# Altium PCB Pod_Islands_Panel.PcbDoc (part 1 of 10)
Units mm, origin at the board's own origin, x right, y up, seen from the top; angles counter-clockwise.
Board outline 95.7 x 83.7 mm, 6 copper layers (Top Layer, Inner1, Inner2, Inner3, Inner4, Bottom Layer), stack 0.82 mm thick; 1100 components, 940 nets, 4944 pads, 3680 vias.
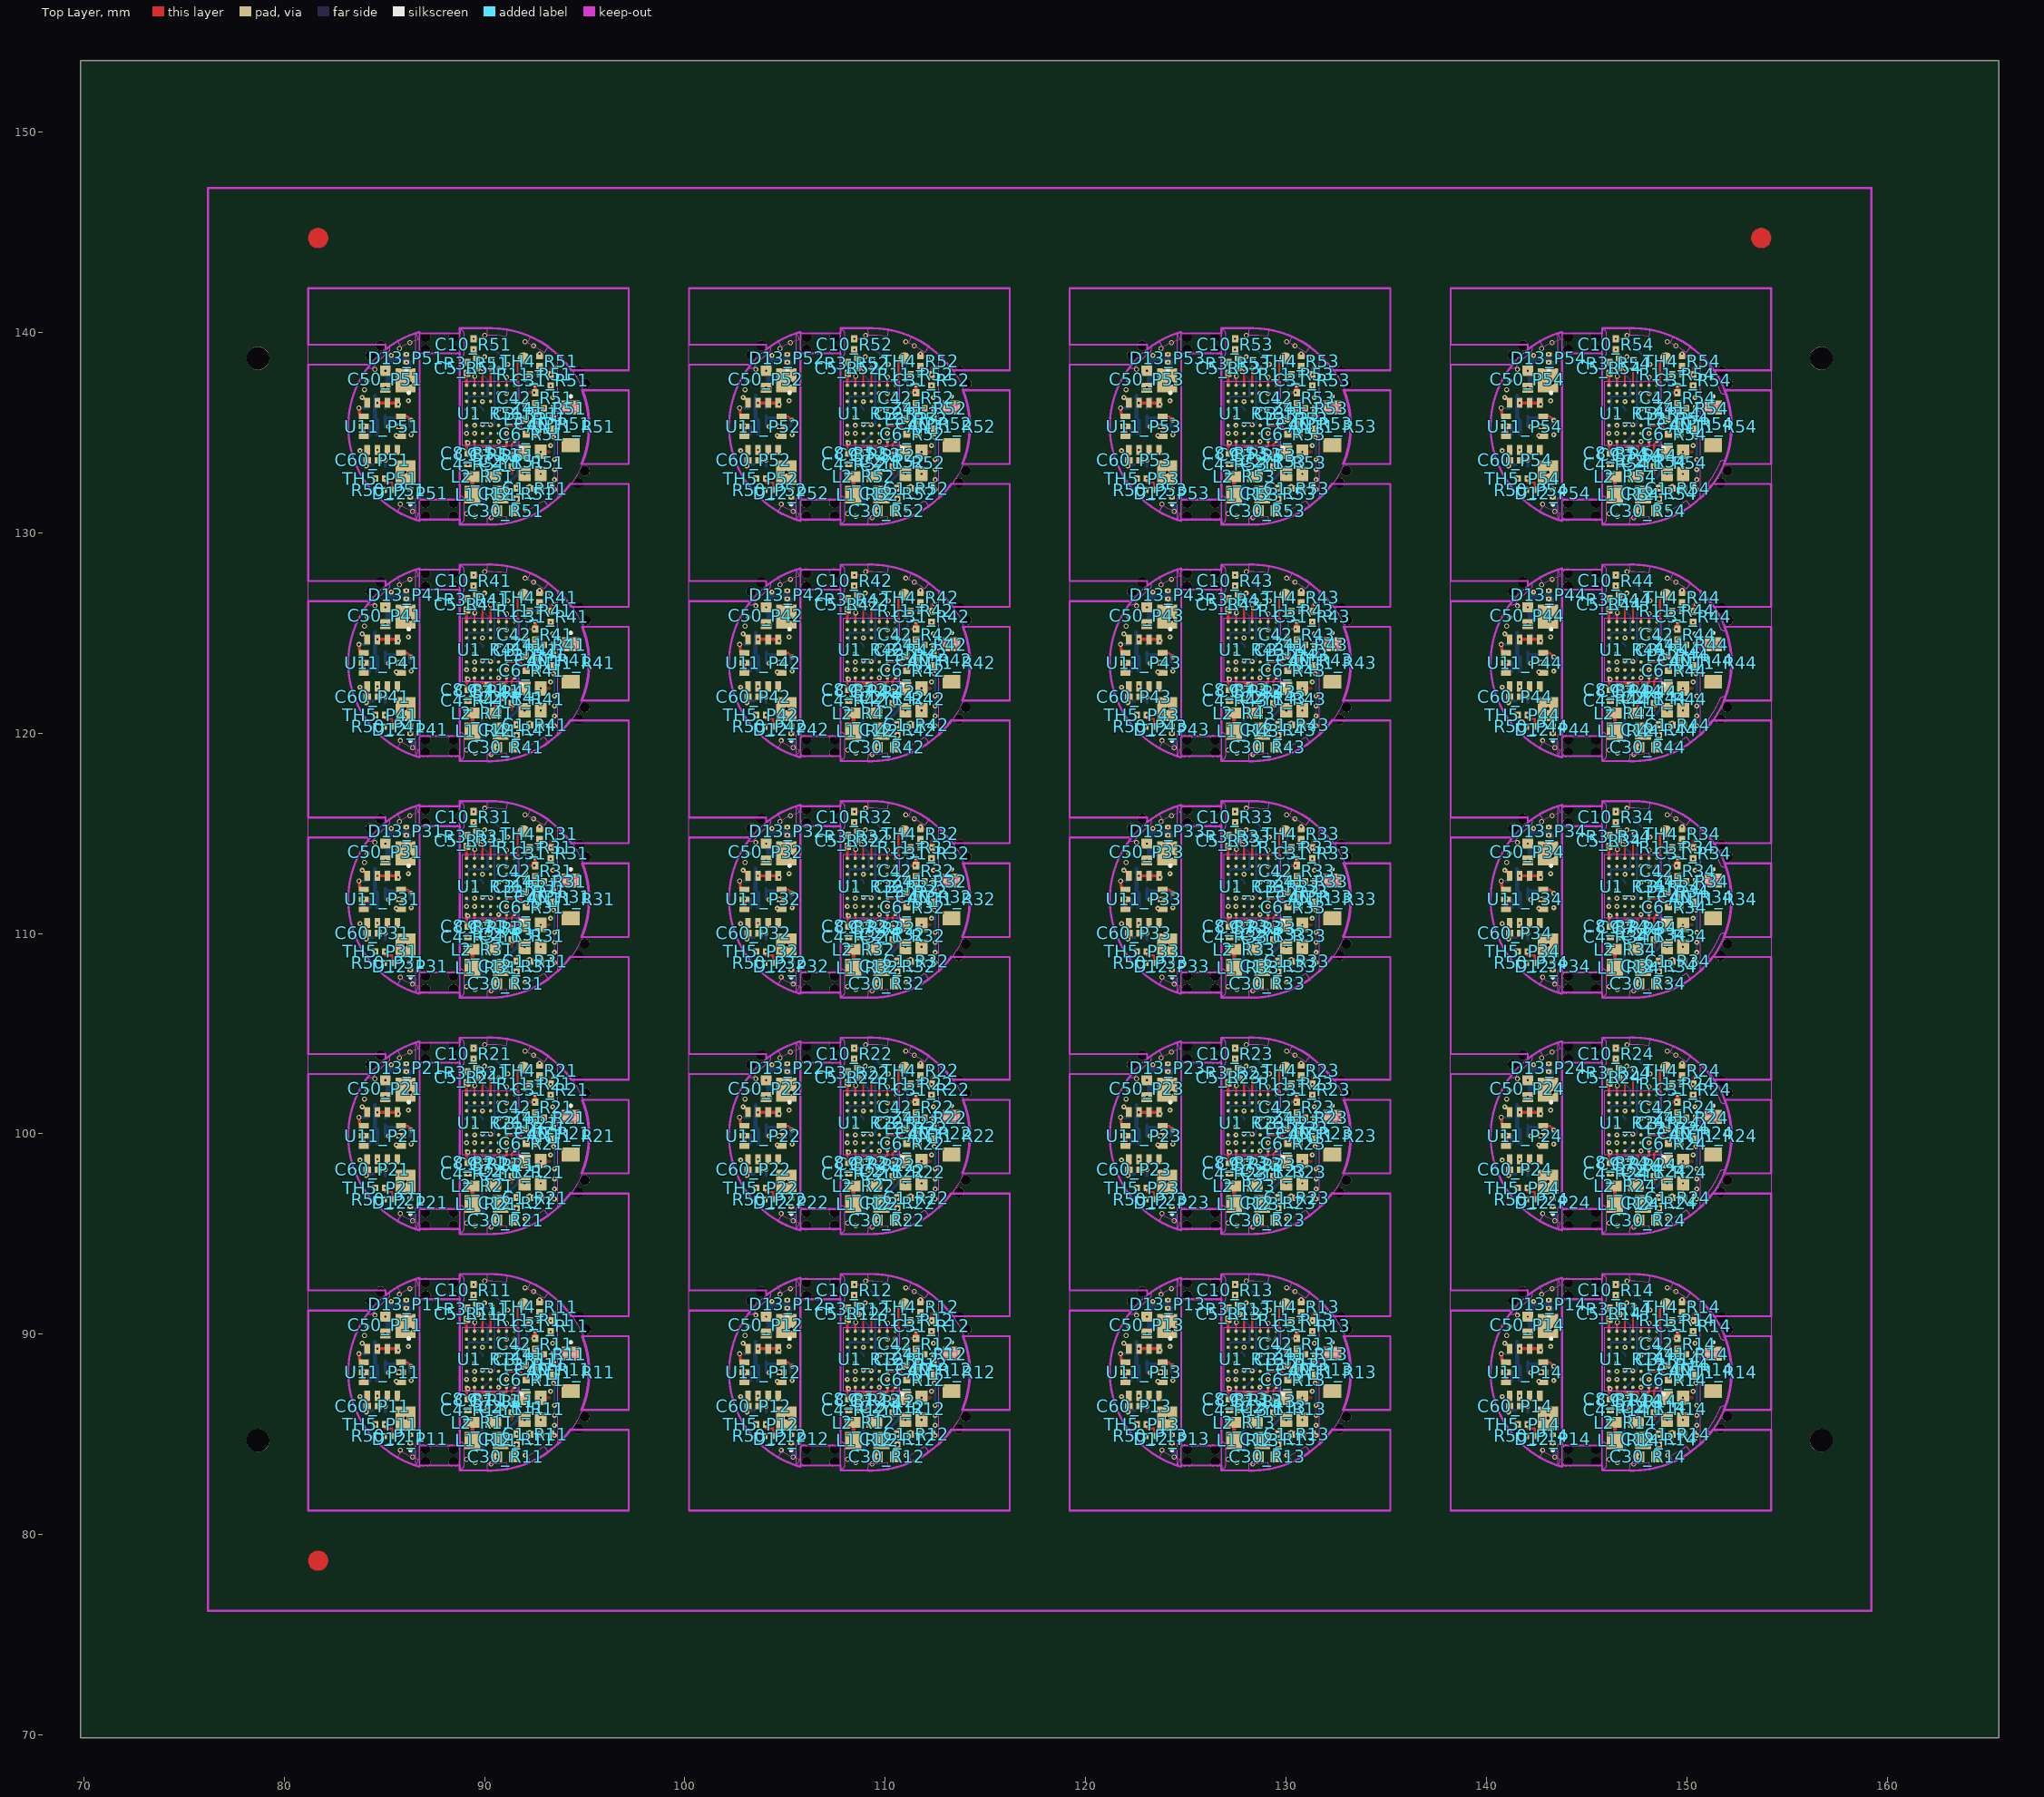
[diagram p0: Top Layer view]
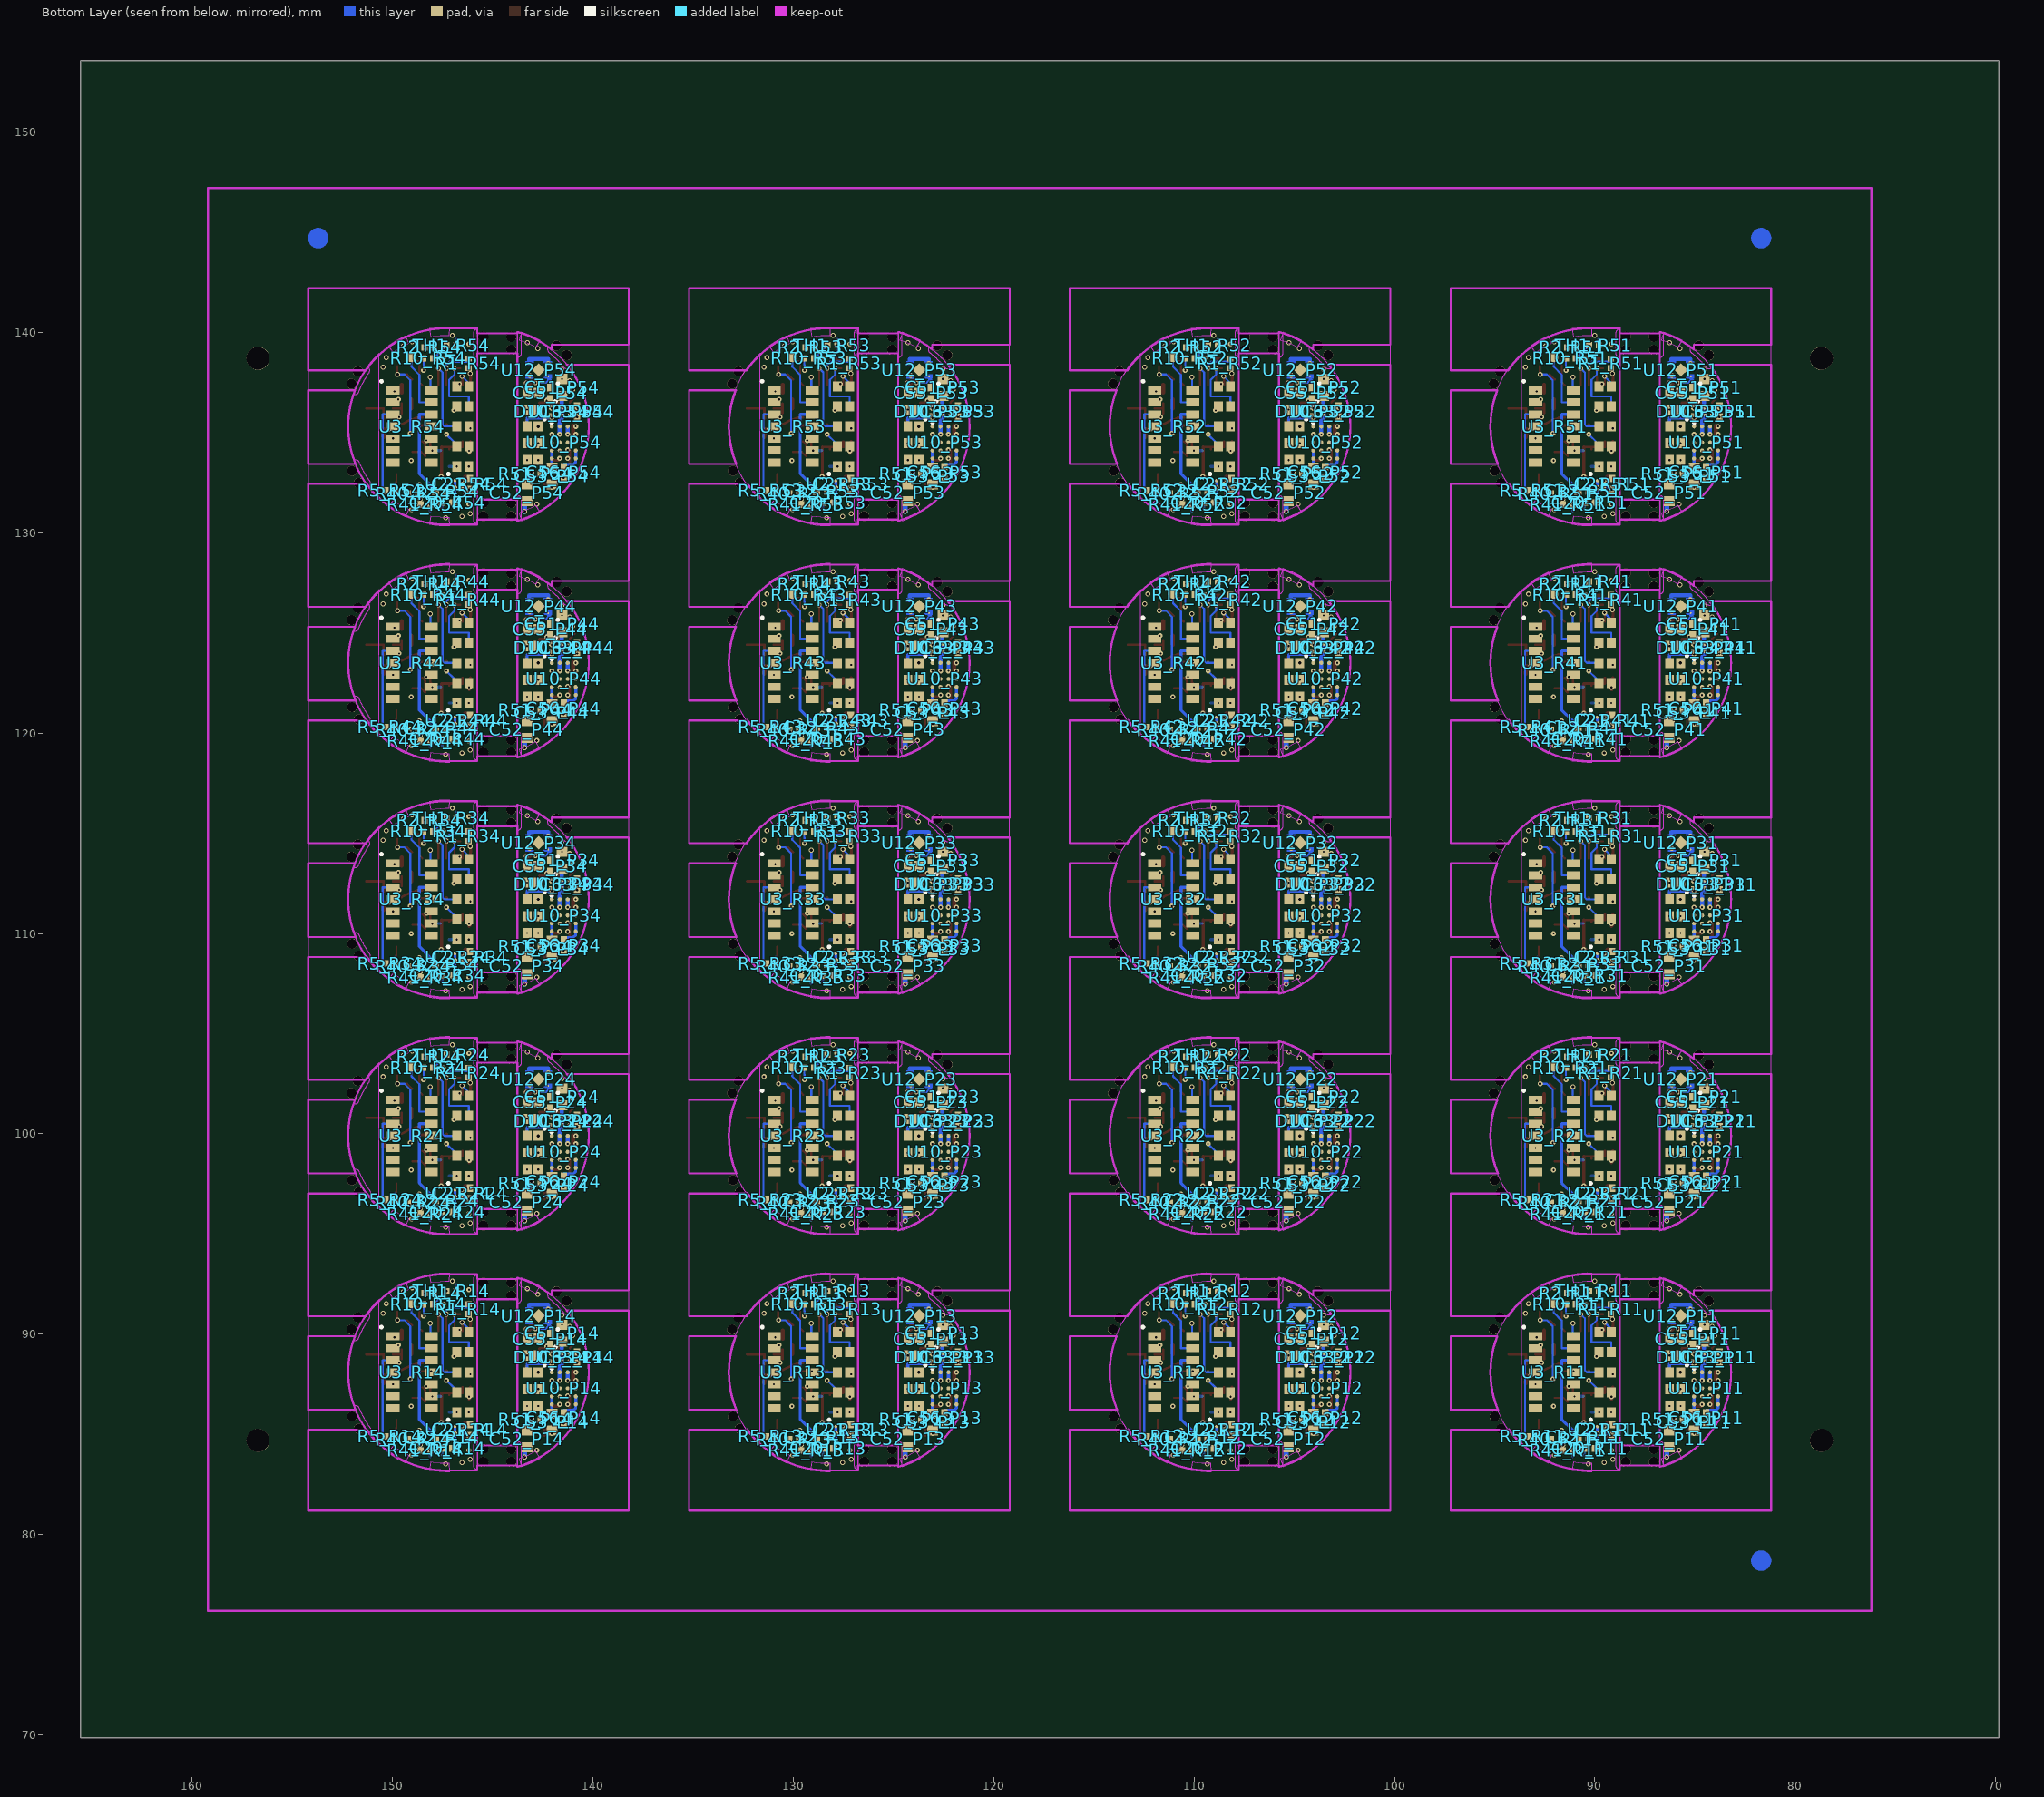
[diagram p1: Bottom Layer view, seen from below]
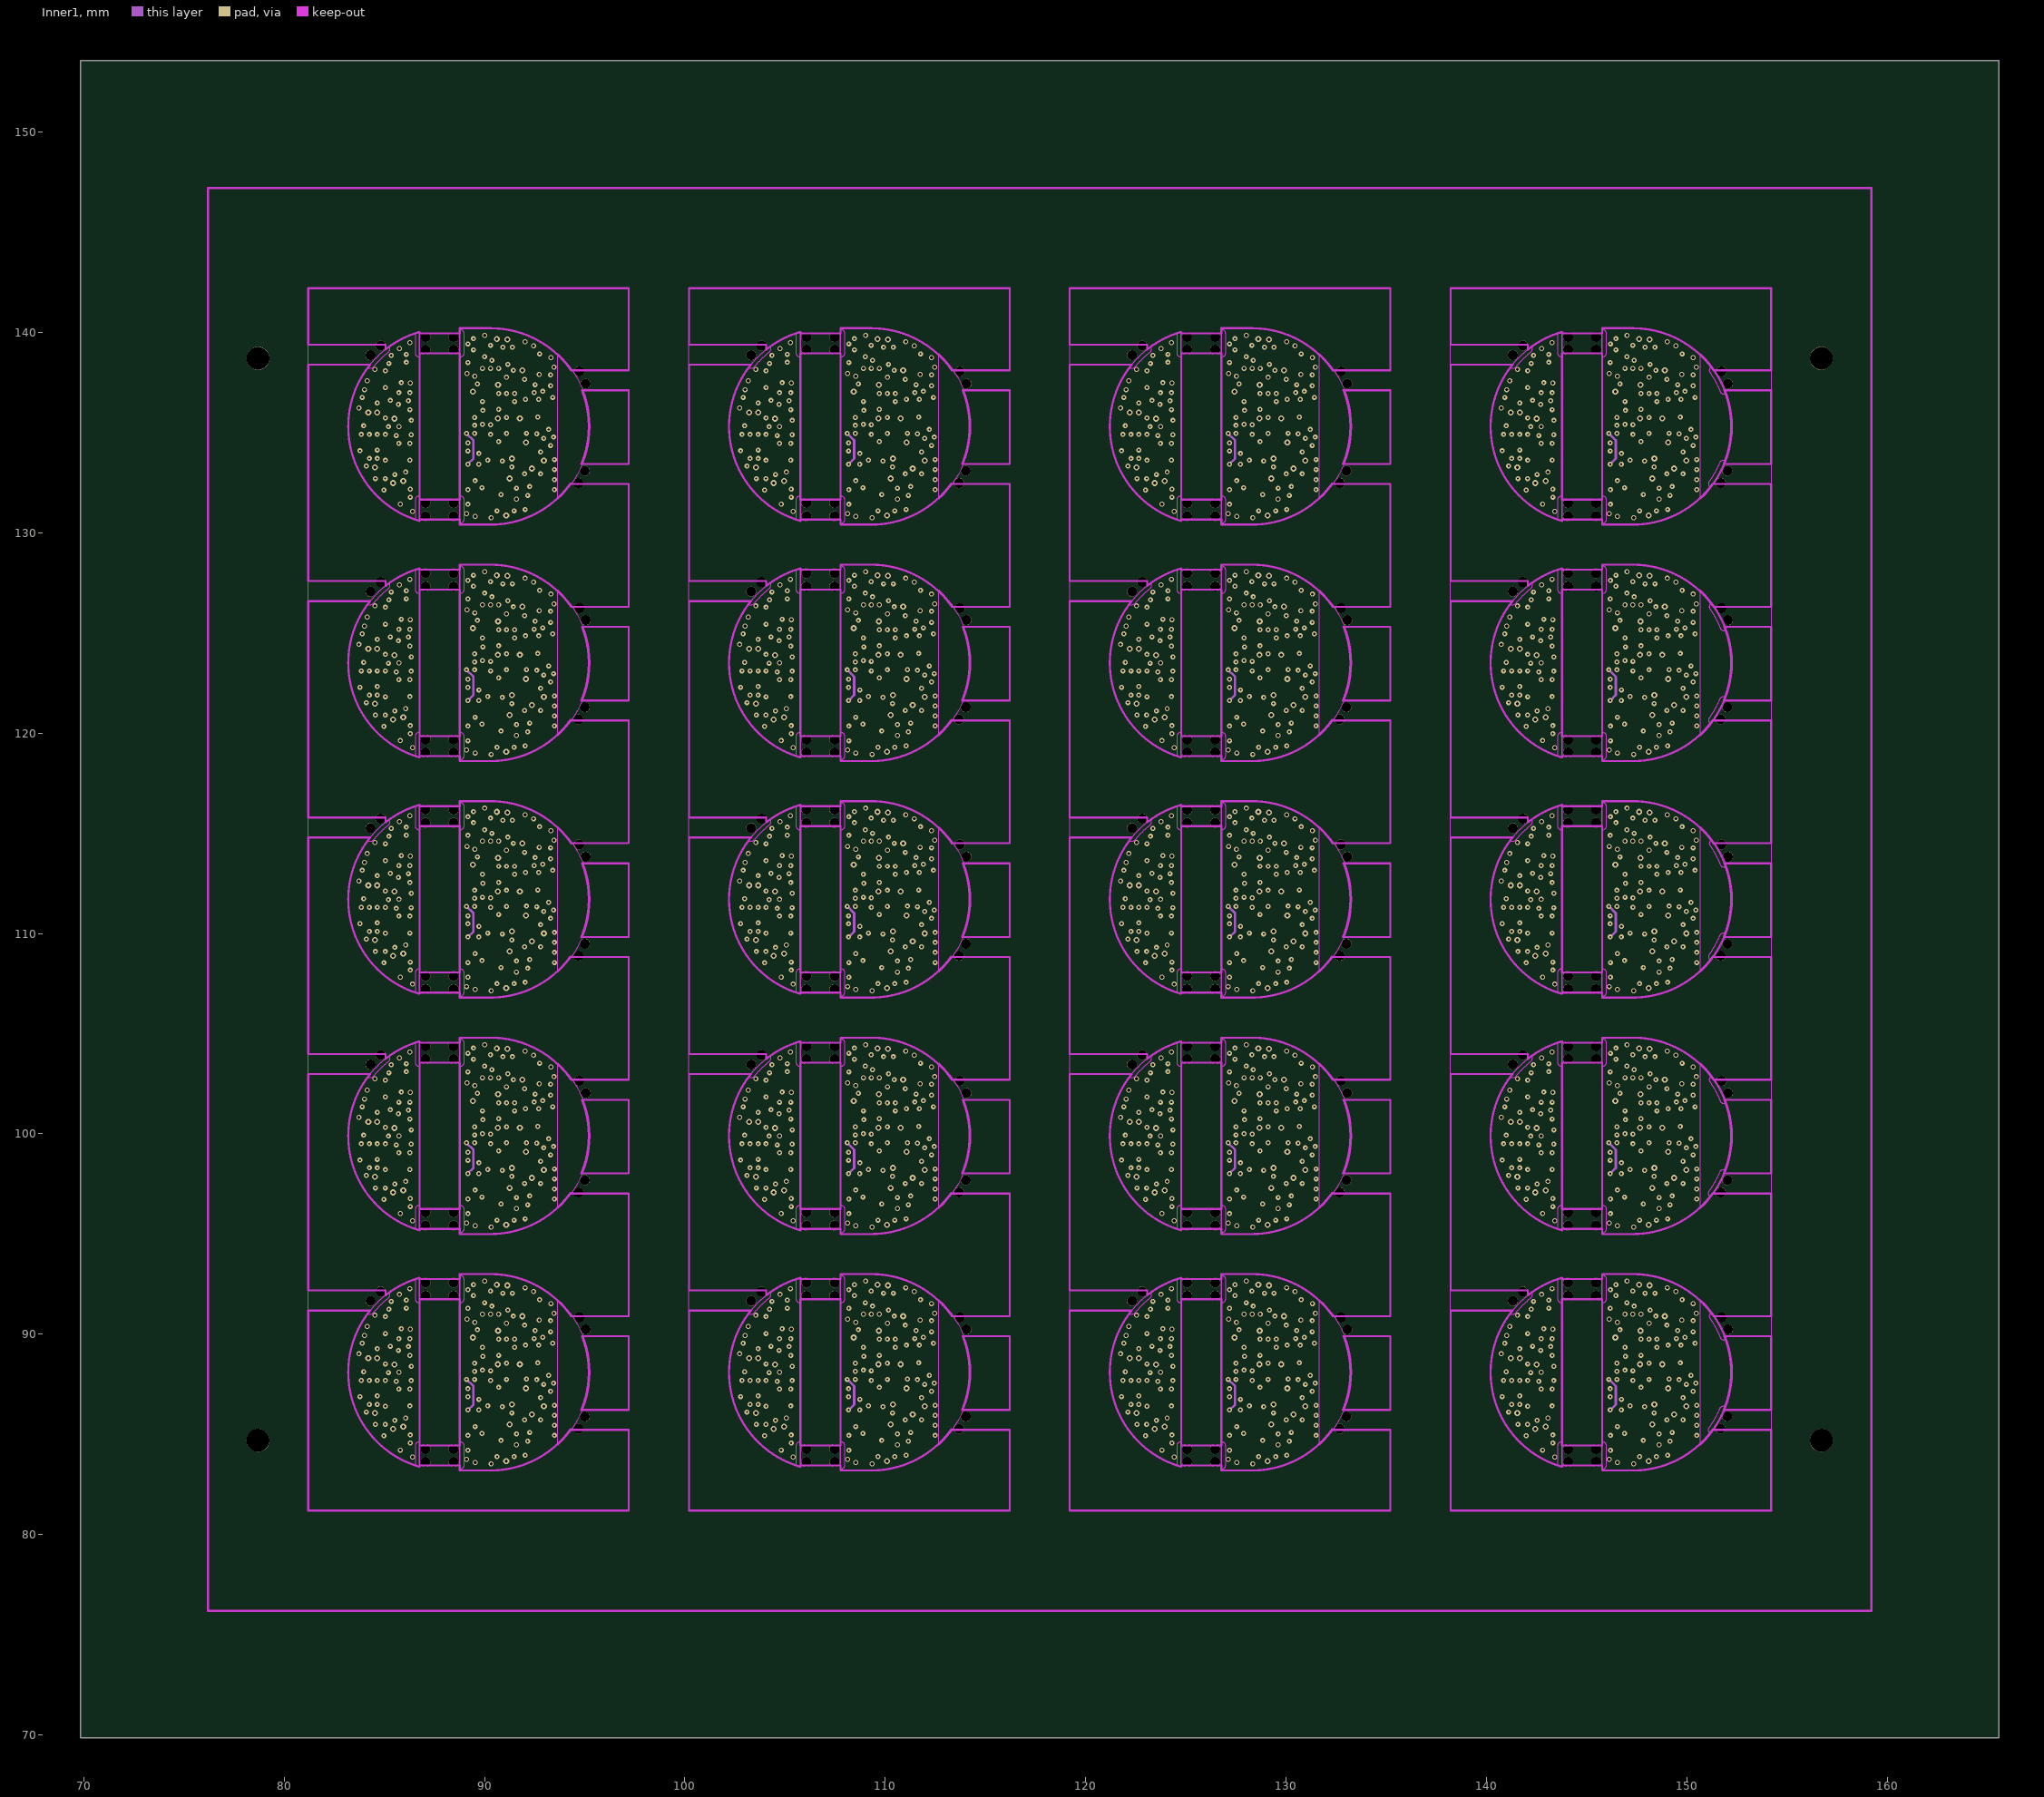
[diagram p2: Inner1]
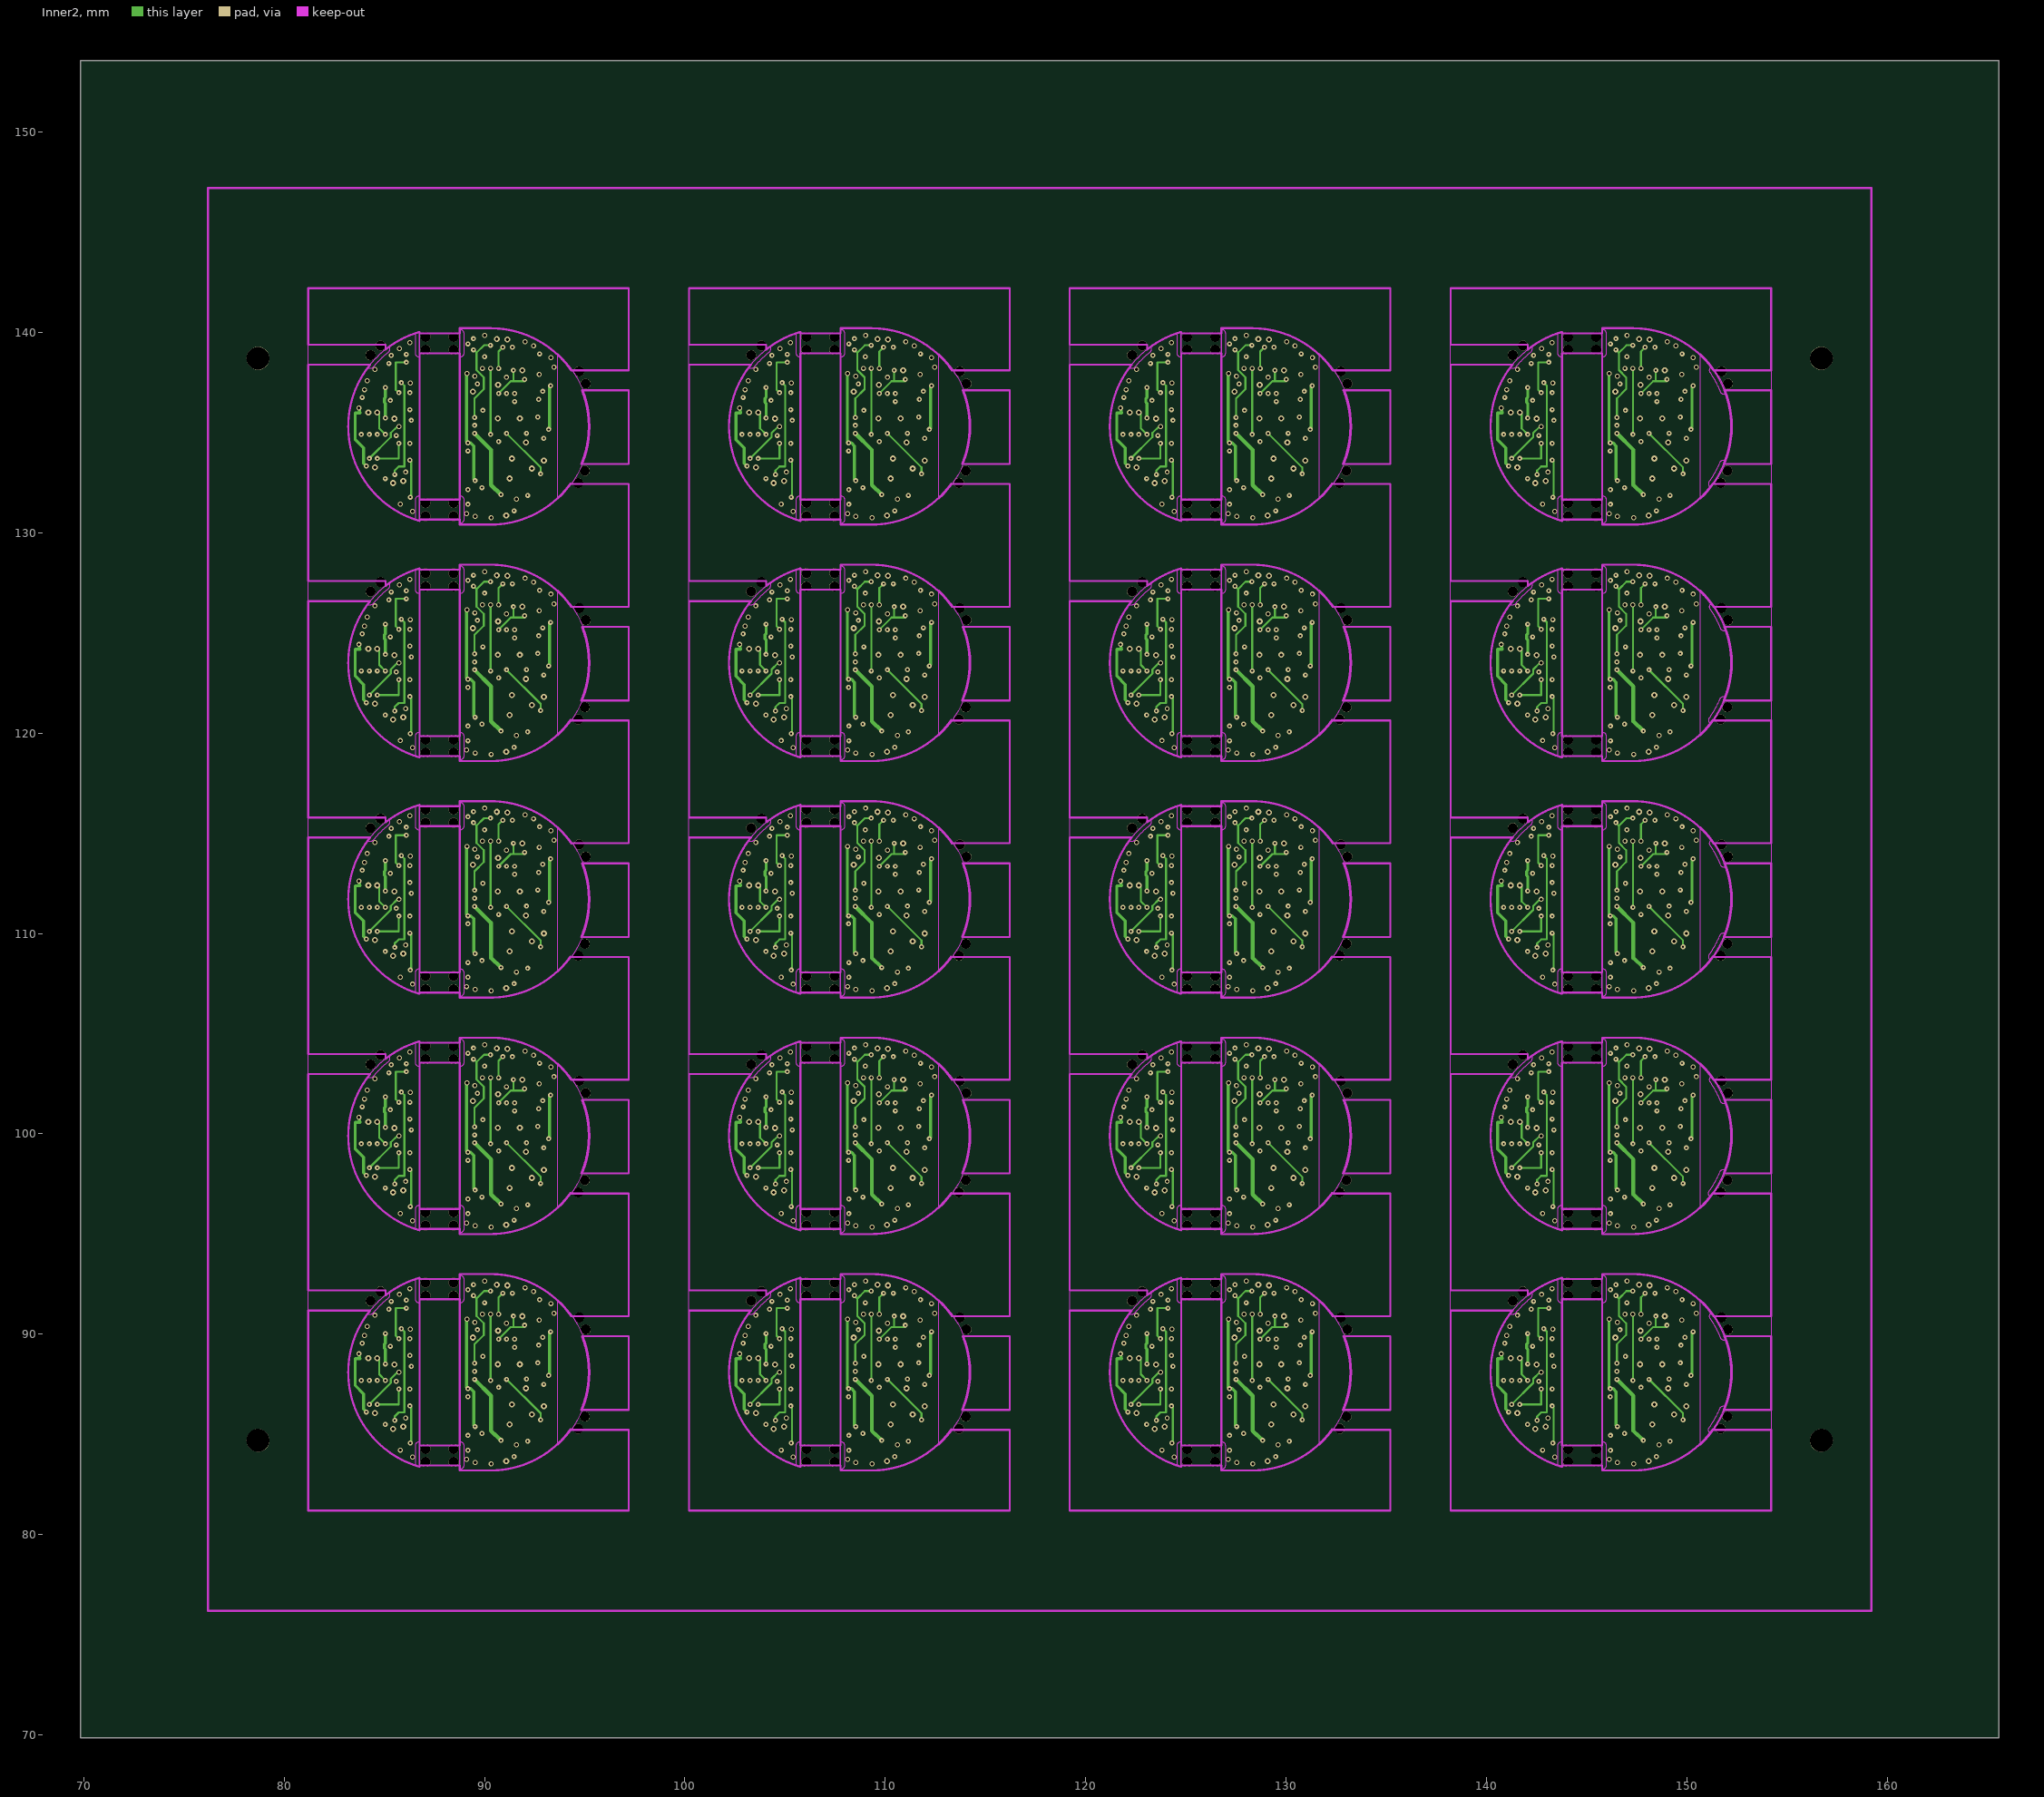
[diagram p3: Inner2]
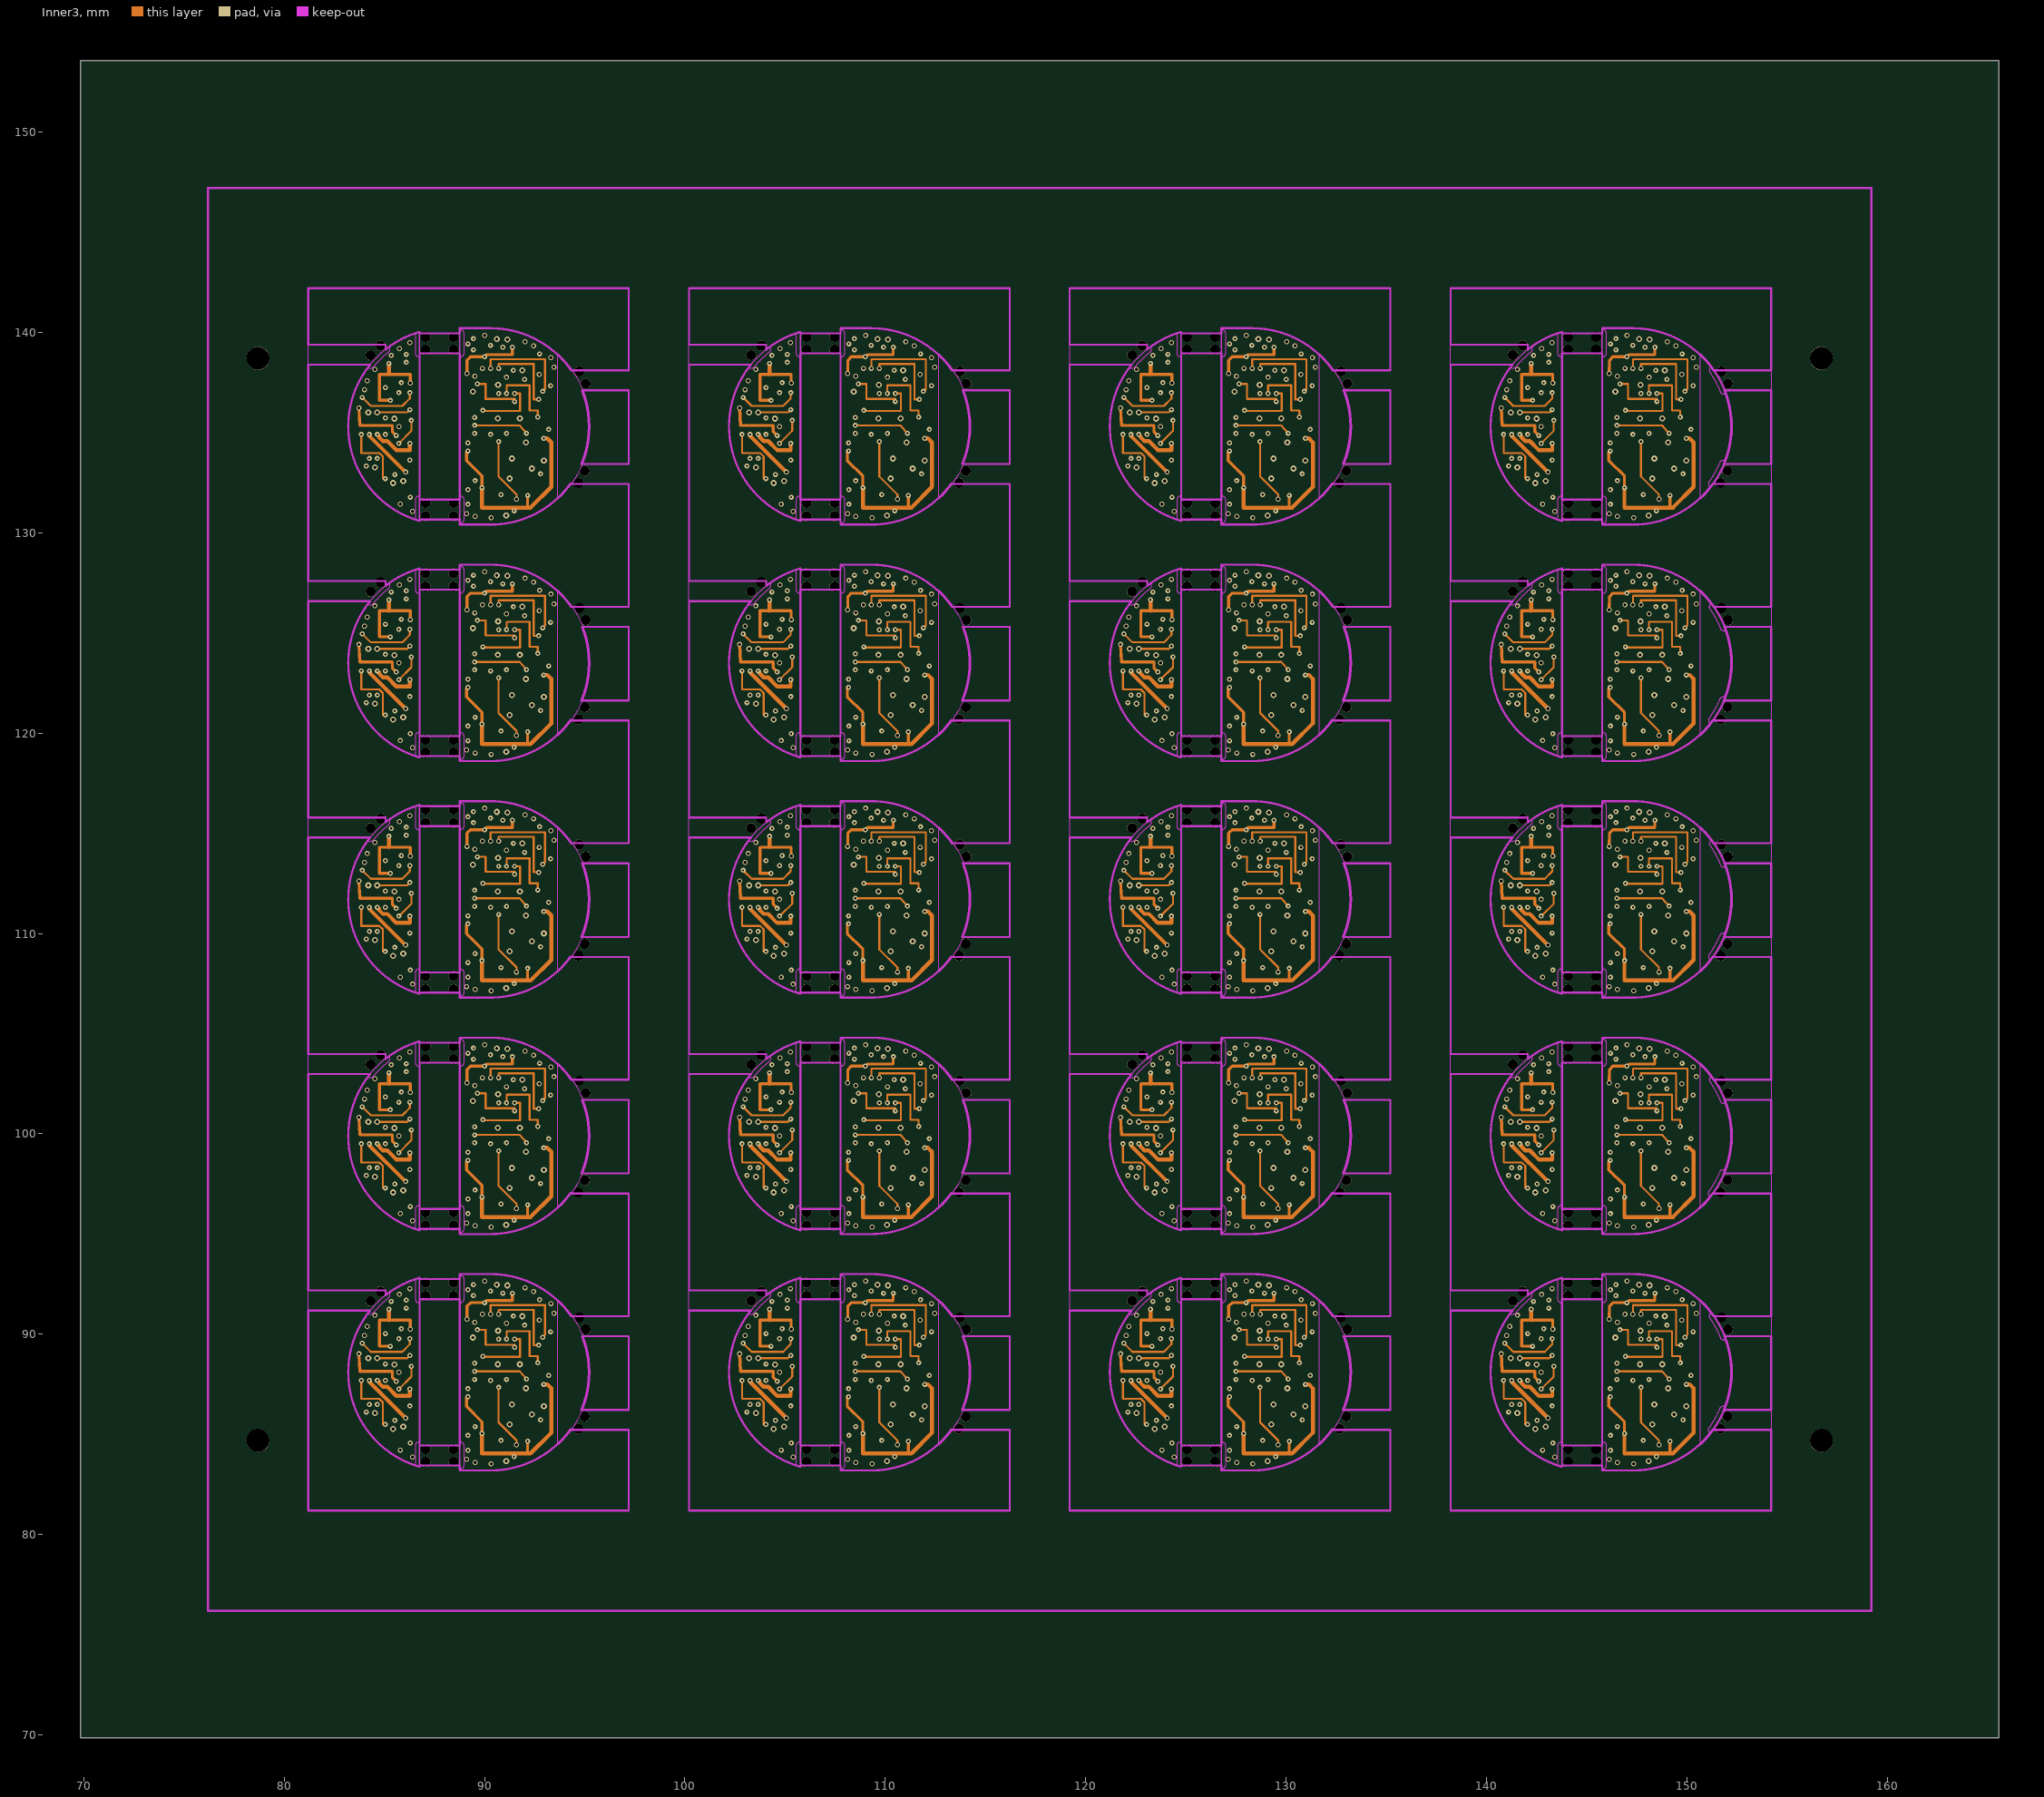
[diagram p4: Inner3]
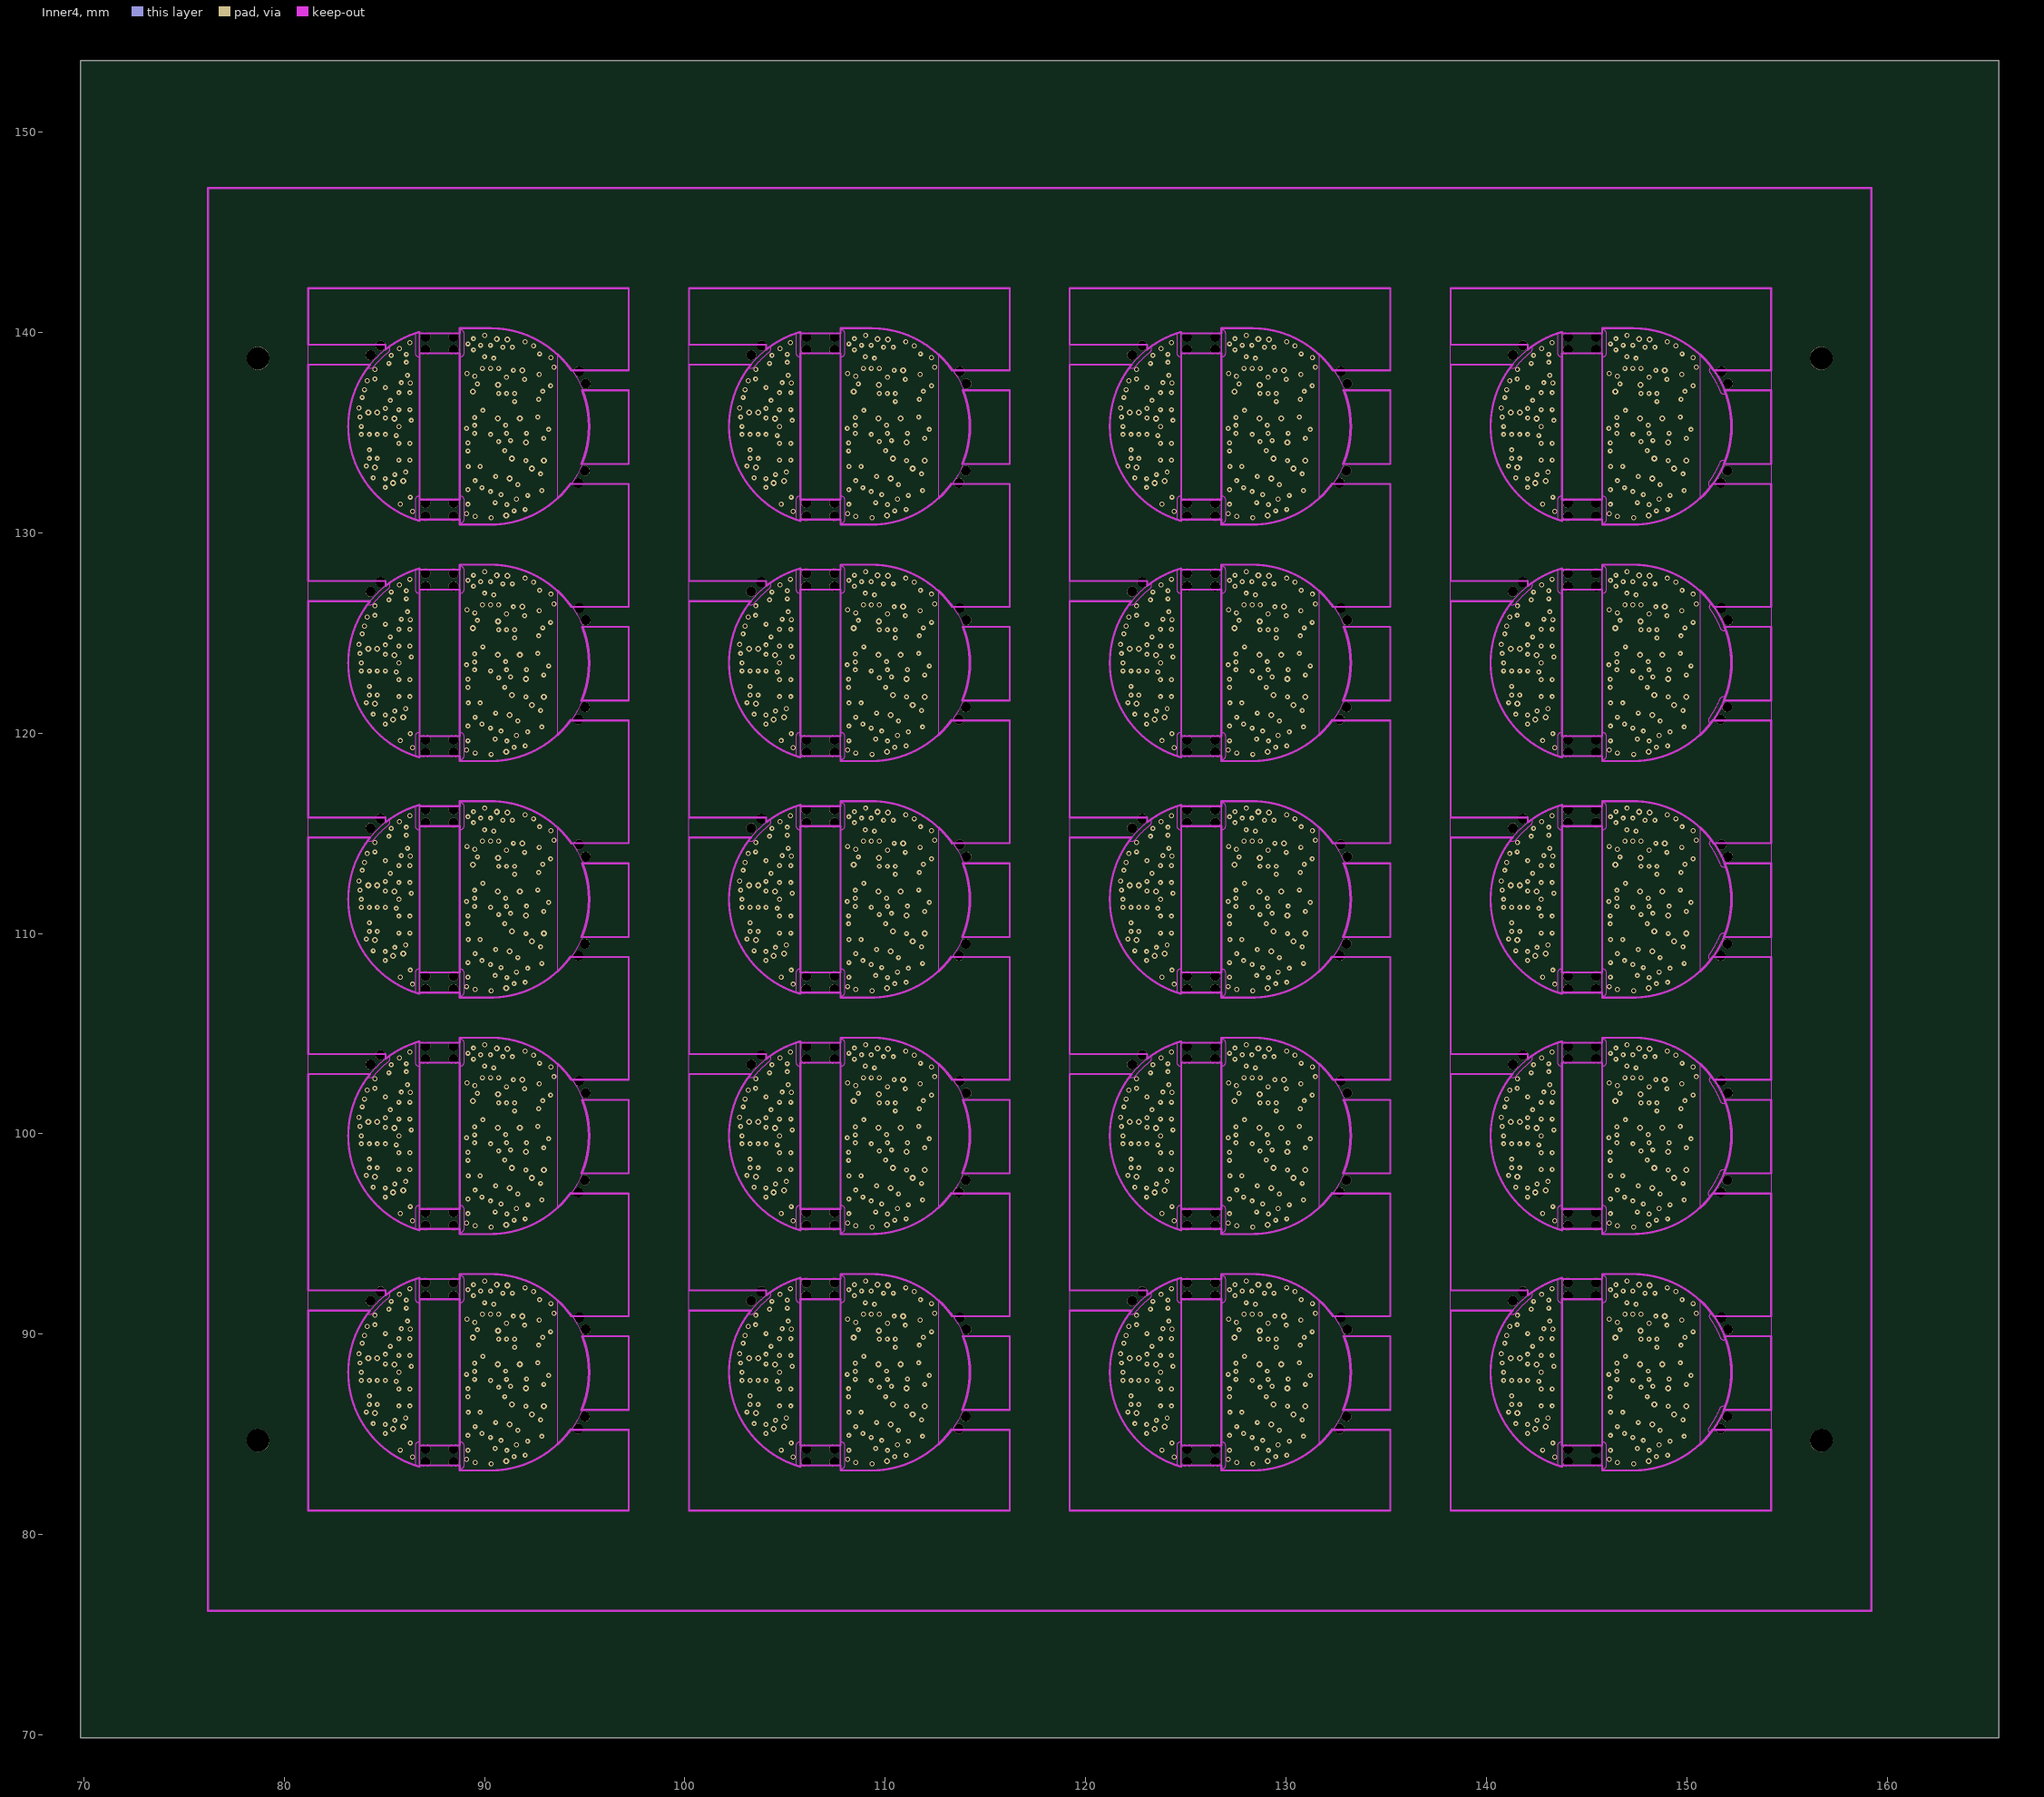
[diagram p5: Inner4]

## Layer stack, top to bottom
Top Solder Mask Layer: solder mask 0.012, Dk 3.8
Top Layer: signal copper 0.035
Dielectric1: surface 0.0964, 2313 PP, Dk 4.1
Inner1: signal copper 0.0152
Dielectric2: surface 0.15, Core 0.15, Dk 4.6
Inner2: signal copper 0.0152
Dielectric3: surface 0.1964, 2x2313 PP, Dk 4.1
Inner3: signal copper 0.0152
Dielectric4: surface 0.15, Core 0.15, Dk 4.6
Inner4: signal copper 0.0152
Dielectric5: surface 0.0964, 2313 PP, Dk 4.1
Bottom Layer: signal copper 0.035
Bottom Solder Mask Layer: solder mask 0.012, Dk 3.8

## Board outline
165.55,69.85 69.85,69.85 69.85,153.55 165.55,153.55

## Design rules (kind name [scope] priority, off if disabled: settings)
BoardOutlineClearance copperThickness1oz [All] p0: genericclearance=0.254 ignorepadtopadclearanceinfootprint=FALSE except(0: Arc-SplitContinuation Track-SplitContinuation SMDPad-SplitContinuation THPad-SplitContinuation Via-SplitContinuation Fill-SplitContinuation Poly-SplitContinuation Region-SplitContinuation Text-SplitContinuation)
BoardOutlineClearance copperThickness2oz [All] p0: genericclearance=0.254 ignorepadtopadclearanceinfootprint=FALSE except(0: Arc-SplitContinuation Track-SplitContinuation SMDPad-SplitContinuation THPad-SplitContinuation Via-SplitContinuation Fill-SplitContinuation Poly-SplitContinuation Region-SplitContinuation Text-SplitContinuation)
BoardOutlineClearance otherClearance [All] p0: genericclearance=0.254 ignorepadtopadclearanceinfootprint=FALSE except(0: Arc-SplitContinuation Track-SplitContinuation SMDPad-SplitContinuation THPad-SplitContinuation Via-SplitContinuation Fill-SplitContinuation Poly-SplitContinuation Region-SplitContinuation Text-SplitContinuation)
Clearance copperThickness1oz [All] p1: gap=0.178 ignorepadtopadclearanceinfootprint=FALSE
Clearance copperThickness2oz [All] p1: gap=0.178 ignorepadtopadclearanceinfootprint=FALSE
Clearance otherClearance [All] p1: gap=0.178 ignorepadtopadclearanceinfootprint=FALSE
DiffPairsRouting differentialPair [All] p1: maxuncoupledlength=10 minlimit=6 maxlimit=Infinity mostfreqgap=6 toplayer_minwidth=5 toplayer_prefwidth=10 toplayer_maxwidth=100 bottomlayer_minwidth=5 bottomlayer_prefwidth=10 bottomlayer_maxwidth=100 midlayer1_minwidth=5 midlayer1_prefwidth=10 midlayer1_maxwidth=100 midlayer2_minwidth=5 midlayer2_prefwidth=10 midlayer2_maxwidth=100 midlayer3_minwidth=5 midlayer3_prefwidth=10 midlayer3_maxwidth=100 midlayer4_minwidth=5 midlayer4_prefwidth=10 midlayer4_maxwidth=100
PasteMaskExpansion pasteMaskExpansion [All] p1: expansion=0
PlaneConnect innerPlane [All] p1: planeconnectstyle=Relief reliefexpansion=0.508 reliefentries=4 reliefconductorwidth=0.15 reliefairgap=0.15
PolygonConnect copperRegion [All] p1: connectstyle=Relief reliefentries=4 reliefconductorwidth=5.9055 polygonreliefangle="90 Angle" airgapwidth=5.9055
RoutingVias viaSize [All] p1: viastyle="Through Hole" holewidth=5.9056 minholewidth=5.9056 maxholewidth=248.0314 width=5.9056 minwidth=5.9056 maxwidth=248.0314
RoutingVias microVia [All] p1: viastyle="Through Hole" holewidth=3.937 minholewidth=3.937 maxholewidth=248.0314 width=3.937 minwidth=3.937 maxwidth=248.0314
RoutingVias buriedVia [All] p1: viastyle="Through Hole" holewidth=5.9056 minholewidth=5.9056 maxholewidth=248.0314 width=5.9056 minwidth=5.9056 maxwidth=248.0314
SolderMaskExpansion solderMaskExpansion [IsVia] p1: useseparateexpansions=TRUE expansion=-1000 expansionbottom=-1000
SolderMaskExpansion solderMaskExpansion [All] p2: useseparateexpansions=TRUE expansion=2 expansionbottom=2
Width copperThickness1oz [All] p1: maxlimit=100 minlimit=4 preferedwidth=4
Width copperThickness2oz [All] p1: maxlimit=100 minlimit=8 preferedwidth=10
Width RF_124 [All] p1: maxlimit=5 minlimit=5 preferedwidth=5
Width SW_200 [All] p1: maxlimit=39 minlimit=8 preferedwidth=10
Width PWR_150 [All] p1: maxlimit=39 minlimit=6 preferedwidth=8
Width DEC_150 [All] p1: maxlimit=20 minlimit=5 preferedwidth=6
Width SIG_100 [All] p1: maxlimit=10 minlimit=4 preferedwidth=4

## Components (designator, comment, footprint, x,y, rotation, side; value= is the part's Value field where it differs from the comment)
ANT1_R11 "KH-1608-H08" ANT-SMD_L1.7-W0.9 94.3,88.1 r90 top
ANT1_R12 "KH-1608-H08" ANT-SMD_L1.7-W0.9 113.3,88.1 r90 top
ANT1_R13 "KH-1608-H08" ANT-SMD_L1.7-W0.9 132.3,88.1 r90 top
ANT1_R14 "KH-1608-H08" ANT-SMD_L1.7-W0.9 151.3,88.1 r90 top
ANT1_R21 "KH-1608-H08" ANT-SMD_L1.7-W0.9 94.3,99.9 r90 top
ANT1_R22 "KH-1608-H08" ANT-SMD_L1.7-W0.9 113.3,99.9 r90 top
ANT1_R23 "KH-1608-H08" ANT-SMD_L1.7-W0.9 132.3,99.9 r90 top
ANT1_R24 "KH-1608-H08" ANT-SMD_L1.7-W0.9 151.3,99.9 r90 top
ANT1_R31 "KH-1608-H08" ANT-SMD_L1.7-W0.9 94.3,111.7 r90 top
ANT1_R32 "KH-1608-H08" ANT-SMD_L1.7-W0.9 113.3,111.7 r90 top
ANT1_R33 "KH-1608-H08" ANT-SMD_L1.7-W0.9 132.3,111.7 r90 top
ANT1_R34 "KH-1608-H08" ANT-SMD_L1.7-W0.9 151.3,111.7 r90 top
ANT1_R41 "KH-1608-H08" ANT-SMD_L1.7-W0.9 94.3,123.5 r90 top
ANT1_R42 "KH-1608-H08" ANT-SMD_L1.7-W0.9 113.3,123.5 r90 top
ANT1_R43 "KH-1608-H08" ANT-SMD_L1.7-W0.9 132.3,123.5 r90 top
ANT1_R44 "KH-1608-H08" ANT-SMD_L1.7-W0.9 151.3,123.5 r90 top
ANT1_R51 "KH-1608-H08" ANT-SMD_L1.7-W0.9 94.3,135.3 r90 top
ANT1_R52 "KH-1608-H08" ANT-SMD_L1.7-W0.9 113.3,135.3 r90 top
ANT1_R53 "KH-1608-H08" ANT-SMD_L1.7-W0.9 132.3,135.3 r90 top
ANT1_R54 "KH-1608-H08" ANT-SMD_L1.7-W0.9 151.3,135.3 r90 top
C1_R11 "12pF" C0201 92.53,85 r180 top
C1_R12 "12pF" C0201 111.53,85 r180 top
C1_R13 "12pF" C0201 130.53,85 r180 top
C1_R14 "12pF" C0201 149.53,85 r180 top
C1_R21 "12pF" C0201 92.53,96.8 r180 top
C1_R22 "12pF" C0201 111.53,96.8 r180 top
C1_R23 "12pF" C0201 130.53,96.8 r180 top
C1_R24 "12pF" C0201 149.53,96.8 r180 top
C1_R31 "12pF" C0201 92.53,108.6 r180 top
C1_R32 "12pF" C0201 111.53,108.6 r180 top
C1_R33 "12pF" C0201 130.53,108.6 r180 top
C1_R34 "12pF" C0201 149.53,108.6 r180 top
C1_R41 "12pF" C0201 92.53,120.4 r180 top
C1_R42 "12pF" C0201 111.53,120.4 r180 top
C1_R43 "12pF" C0201 130.53,120.4 r180 top
C1_R44 "12pF" C0201 149.53,120.4 r180 top
C1_R51 "12pF" C0201 92.53,132.2 r180 top
C1_R52 "12pF" C0201 111.53,132.2 r180 top
C1_R53 "12pF" C0201 130.53,132.2 r180 top
C1_R54 "12pF" C0201 149.53,132.2 r180 top
C2_R11 "12pF" C0201 91.36,86.35 r270 top
C2_R12 "12pF" C0201 110.36,86.35 r270 top
C2_R13 "12pF" C0201 129.36,86.35 r270 top
C2_R14 "12pF" C0201 148.36,86.35 r270 top
C2_R21 "12pF" C0201 91.36,98.15 r270 top
C2_R22 "12pF" C0201 110.36,98.15 r270 top
C2_R23 "12pF" C0201 129.36,98.15 r270 top
C2_R24 "12pF" C0201 148.36,98.15 r270 top
C2_R31 "12pF" C0201 91.36,109.95 r270 top
C2_R32 "12pF" C0201 110.36,109.95 r270 top
C2_R33 "12pF" C0201 129.36,109.95 r270 top
C2_R34 "12pF" C0201 148.36,109.95 r270 top
C2_R41 "12pF" C0201 91.36,121.75 r270 top
C2_R42 "12pF" C0201 110.36,121.75 r270 top
C2_R43 "12pF" C0201 129.36,121.75 r270 top
C2_R44 "12pF" C0201 148.36,121.75 r270 top
C2_R51 "12pF" C0201 91.36,133.55 r270 top
C2_R52 "12pF" C0201 110.36,133.55 r270 top
C2_R53 "12pF" C0201 129.36,133.55 r270 top
C2_R54 "12pF" C0201 148.36,133.55 r270 top
C3_R11 "1pF" C0201 92.05,88.727 r90 top
C3_R12 "1pF" C0201 111.05,88.727 r90 top
C3_R13 "1pF" C0201 130.05,88.727 r90 top
C3_R14 "1pF" C0201 149.05,88.727 r90 top
C3_R21 "1pF" C0201 92.05,100.527 r90 top
C3_R22 "1pF" C0201 111.05,100.527 r90 top
C3_R23 "1pF" C0201 130.05,100.527 r90 top
C3_R24 "1pF" C0201 149.05,100.527 r90 top
C3_R31 "1pF" C0201 92.05,112.327 r90 top
C3_R32 "1pF" C0201 111.05,112.327 r90 top
C3_R33 "1pF" C0201 130.05,112.327 r90 top
C3_R34 "1pF" C0201 149.05,112.327 r90 top
C3_R41 "1pF" C0201 92.05,124.127 r90 top
C3_R42 "1pF" C0201 111.05,124.127 r90 top
C3_R43 "1pF" C0201 130.05,124.127 r90 top
C3_R44 "1pF" C0201 149.05,124.127 r90 top
C3_R51 "1pF" C0201 92.05,135.927 r90 top
C3_R52 "1pF" C0201 111.05,135.927 r90 top
C3_R53 "1pF" C0201 130.05,135.927 r90 top
C3_R54 "1pF" C0201 149.05,135.927 r90 top
C4_R11 "100nF" C0201 89.444,86.22 r0 top
C4_R12 "100nF" C0201 108.444,86.22 r0 top
C4_R13 "100nF" C0201 127.444,86.22 r0 top
C4_R14 "100nF" C0201 146.445,86.22 r0 top
C4_R21 "100nF" C0201 89.444,98.02 r0 top
C4_R22 "100nF" C0201 108.444,98.02 r0 top
C4_R23 "100nF" C0201 127.444,98.02 r0 top
C4_R24 "100nF" C0201 146.445,98.02 r0 top
C4_R31 "100nF" C0201 89.444,109.82 r0 top
C4_R32 "100nF" C0201 108.444,109.82 r0 top
C4_R33 "100nF" C0201 127.444,109.82 r0 top
C4_R34 "100nF" C0201 146.445,109.82 r0 top
C4_R41 "100nF" C0201 89.444,121.62 r0 top
C4_R42 "100nF" C0201 108.444,121.62 r0 top
C4_R43 "100nF" C0201 127.444,121.62 r0 top
C4_R44 "100nF" C0201 146.445,121.62 r0 top
C4_R51 "100nF" C0201 89.444,133.42 r0 top
C4_R52 "100nF" C0201 108.444,133.42 r0 top
C4_R53 "100nF" C0201 127.444,133.42 r0 top
C4_R54 "100nF" C0201 146.445,133.42 r0 top
C5_R11 "100nF" C0201 89.123,91.02 r90 top
C5_R12 "100nF" C0201 108.123,91.02 r90 top
C5_R13 "100nF" C0201 127.123,91.02 r90 top
C5_R14 "100nF" C0201 146.123,91.02 r90 top
C5_R21 "100nF" C0201 89.123,102.82 r90 top
C5_R22 "100nF" C0201 108.123,102.82 r90 top
C5_R23 "100nF" C0201 127.123,102.82 r90 top
C5_R24 "100nF" C0201 146.123,102.82 r90 top
C5_R31 "100nF" C0201 89.123,114.62 r90 top
C5_R32 "100nF" C0201 108.123,114.62 r90 top
C5_R33 "100nF" C0201 127.123,114.62 r90 top
C5_R34 "100nF" C0201 146.123,114.62 r90 top
C5_R41 "100nF" C0201 89.123,126.42 r90 top
C5_R42 "100nF" C0201 108.123,126.42 r90 top
C5_R43 "100nF" C0201 127.123,126.42 r90 top
C5_R44 "100nF" C0201 146.123,126.42 r90 top
C5_R51 "100nF" C0201 89.123,138.22 r90 top
C5_R52 "100nF" C0201 108.123,138.22 r90 top
C5_R53 "100nF" C0201 127.123,138.22 r90 top
C5_R54 "100nF" C0201 146.123,138.22 r90 top
C6_R11 "100pF" C0201 92.35,87.71 r0 top
C6_R12 "100pF" C0201 111.35,87.71 r0 top
C6_R13 "100pF" C0201 130.35,87.71 r0 top
C6_R14 "100pF" C0201 149.35,87.71 r0 top
C6_R21 "100pF" C0201 92.35,99.51 r0 top
C6_R22 "100pF" C0201 111.35,99.51 r0 top
C6_R23 "100pF" C0201 130.35,99.51 r0 top
C6_R24 "100pF" C0201 149.35,99.51 r0 top
C6_R31 "100pF" C0201 92.35,111.31 r0 top
C6_R32 "100pF" C0201 111.35,111.31 r0 top
C6_R33 "100pF" C0201 130.35,111.31 r0 top
C6_R34 "100pF" C0201 149.35,111.31 r0 top
C6_R41 "100pF" C0201 92.35,123.11 r0 top
C6_R42 "100pF" C0201 111.35,123.11 r0 top
C6_R43 "100pF" C0201 130.35,123.11 r0 top
C6_R44 "100pF" C0201 149.35,123.11 r0 top
C6_R51 "100pF" C0201 92.35,134.91 r0 top
C6_R52 "100pF" C0201 111.35,134.91 r0 top
C6_R53 "100pF" C0201 130.35,134.91 r0 top
C6_R54 "100pF" C0201 149.35,134.91 r0 top
C7_R11 "100pF" C0201 90.88,86.651 r270 top
C7_R12 "100pF" C0201 109.88,86.651 r270 top
C7_R13 "100pF" C0201 128.88,86.651 r270 top
C7_R14 "100pF" C0201 147.88,86.651 r270 top
C7_R21 "100pF" C0201 90.88,98.451 r270 top
C7_R22 "100pF" C0201 109.88,98.451 r270 top
C7_R23 "100pF" C0201 128.88,98.451 r270 top
C7_R24 "100pF" C0201 147.88,98.451 r270 top
C7_R31 "100pF" C0201 90.88,110.251 r270 top
C7_R32 "100pF" C0201 109.88,110.251 r270 top
C7_R33 "100pF" C0201 128.88,110.251 r270 top
C7_R34 "100pF" C0201 147.88,110.251 r270 top
C7_R41 "100pF" C0201 90.88,122.051 r270 top
C7_R42 "100pF" C0201 109.88,122.051 r270 top
C7_R43 "100pF" C0201 128.88,122.051 r270 top
C7_R44 "100pF" C0201 147.88,122.051 r270 top
C7_R51 "100pF" C0201 90.88,133.851 r270 top
C7_R52 "100pF" C0201 109.88,133.851 r270 top
C7_R53 "100pF" C0201 128.88,133.851 r270 top
C7_R54 "100pF" C0201 147.88,133.851 r270 top
C8_R11 "4.7uF" C0201 89.449,86.75 r0 top
C8_R12 "4.7uF" C0201 108.449,86.75 r0 top
C8_R13 "4.7uF" C0201 127.449,86.75 r0 top
C8_R14 "4.7uF" C0201 146.449,86.75 r0 top
C8_R21 "4.7uF" C0201 89.449,98.55 r0 top
C8_R22 "4.7uF" C0201 108.449,98.55 r0 top
C8_R23 "4.7uF" C0201 127.449,98.55 r0 top
C8_R24 "4.7uF" C0201 146.449,98.55 r0 top
C8_R31 "4.7uF" C0201 89.449,110.35 r0 top
C8_R32 "4.7uF" C0201 108.449,110.35 r0 top
C8_R33 "4.7uF" C0201 127.449,110.35 r0 top
C8_R34 "4.7uF" C0201 146.449,110.35 r0 top
C8_R41 "4.7uF" C0201 89.449,122.15 r0 top
C8_R42 "4.7uF" C0201 108.449,122.15 r0 top
C8_R43 "4.7uF" C0201 127.449,122.15 r0 top
C8_R44 "4.7uF" C0201 146.449,122.15 r0 top
C8_R51 "4.7uF" C0201 89.449,133.95 r0 top
C8_R52 "4.7uF" C0201 108.449,133.95 r0 top
C8_R53 "4.7uF" C0201 127.449,133.95 r0 top
C8_R54 "4.7uF" C0201 146.449,133.95 r0 top
C9_R11 "1uF" C0201 90.16,86.696 r270 top
C9_R12 "1uF" C0201 109.16,86.696 r270 top
C9_R13 "1uF" C0201 128.16,86.696 r270 top
C9_R14 "1uF" C0201 147.16,86.696 r270 top
C9_R21 "1uF" C0201 90.16,98.496 r270 top
C9_R22 "1uF" C0201 109.16,98.496 r270 top
C9_R23 "1uF" C0201 128.16,98.496 r270 top
C9_R24 "1uF" C0201 147.16,98.496 r270 top
C9_R31 "1uF" C0201 90.16,110.296 r270 top
C9_R32 "1uF" C0201 109.16,110.296 r270 top
C9_R33 "1uF" C0201 128.16,110.296 r270 top
C9_R34 "1uF" C0201 147.16,110.296 r270 top
C9_R41 "1uF" C0201 90.16,122.096 r270 top
C9_R42 "1uF" C0201 109.16,122.096 r270 top
C9_R43 "1uF" C0201 128.16,122.096 r270 top
C9_R44 "1uF" C0201 147.16,122.096 r270 top
C9_R51 "1uF" C0201 90.16,133.896 r270 top
C9_R52 "1uF" C0201 109.16,133.896 r270 top
C9_R53 "1uF" C0201 128.16,133.896 r270 top
C9_R54 "1uF" C0201 147.16,133.896 r270 top
C10_R11 "10nF" C0201 89.45,92.2 r90 top
C10_R12 "10nF" C0201 108.45,92.2 r90 top
C10_R13 "10nF" C0201 127.45,92.2 r90 top
C10_R14 "10nF" C0201 146.45,92.2 r90 top
C10_R21 "10nF" C0201 89.45,104 r90 top
C10_R22 "10nF" C0201 108.45,104 r90 top
C10_R23 "10nF" C0201 127.45,104 r90 top
C10_R24 "10nF" C0201 146.45,104 r90 top
C10_R31 "10nF" C0201 89.45,115.8 r90 top
C10_R32 "10nF" C0201 108.45,115.8 r90 top
C10_R33 "10nF" C0201 127.45,115.8 r90 top
C10_R34 "10nF" C0201 146.45,115.8 r90 top
C10_R41 "10nF" C0201 89.45,127.6 r90 top
C10_R42 "10nF" C0201 108.45,127.6 r90 top
C10_R43 "10nF" C0201 127.45,127.6 r90 top
C10_R44 "10nF" C0201 146.45,127.6 r90 top
C10_R51 "10nF" C0201 89.45,139.4 r90 top
C10_R52 "10nF" C0201 108.45,139.4 r90 top
C10_R53 "10nF" C0201 127.45,139.4 r90 top
C10_R54 "10nF" C0201 146.45,139.4 r90 top
C12_R11 "100nF" C0201 91.6,84.75 r90 top
C12_R12 "100nF" C0201 110.6,84.75 r90 top
C12_R13 "100nF" C0201 129.6,84.75 r90 top
C12_R14 "100nF" C0201 148.6,84.75 r90 top
C12_R21 "100nF" C0201 91.6,96.55 r90 top
C12_R22 "100nF" C0201 110.6,96.55 r90 top
C12_R23 "100nF" C0201 129.6,96.55 r90 top
C12_R24 "100nF" C0201 148.6,96.55 r90 top
C12_R31 "100nF" C0201 91.6,108.35 r90 top
C12_R32 "100nF" C0201 110.6,108.35 r90 top
C12_R33 "100nF" C0201 129.6,108.35 r90 top
C12_R34 "100nF" C0201 148.6,108.35 r90 top
C12_R41 "100nF" C0201 91.6,120.15 r90 top
C12_R42 "100nF" C0201 110.6,120.15 r90 top
C12_R43 "100nF" C0201 129.6,120.15 r90 top
C12_R44 "100nF" C0201 148.6,120.15 r90 top
C12_R51 "100nF" C0201 91.6,131.95 r90 top
C12_R52 "100nF" C0201 110.6,131.95 r90 top
C12_R53 "100nF" C0201 129.6,131.95 r90 top
C12_R54 "100nF" C0201 148.6,131.95 r90 top
C20_R11 "1uF" C0201 90.25,84.3 r0 bottom
C20_R12 "1uF" C0201 109.25,84.3 r0 bottom
C20_R13 "1uF" C0201 128.25,84.3 r0 bottom
C20_R14 "1uF" C0201 147.25,84.3 r0 bottom
C20_R21 "1uF" C0201 90.25,96.1 r0 bottom
C20_R22 "1uF" C0201 109.25,96.1 r0 bottom
C20_R23 "1uF" C0201 128.25,96.1 r0 bottom
C20_R24 "1uF" C0201 147.25,96.1 r0 bottom
C20_R31 "1uF" C0201 90.25,107.9 r0 bottom
C20_R32 "1uF" C0201 109.25,107.9 r0 bottom
C20_R33 "1uF" C0201 128.25,107.9 r0 bottom
C20_R34 "1uF" C0201 147.25,107.9 r0 bottom
C20_R41 "1uF" C0201 90.25,119.7 r0 bottom
C20_R42 "1uF" C0201 109.25,119.7 r0 bottom
C20_R43 "1uF" C0201 128.25,119.7 r0 bottom
C20_R44 "1uF" C0201 147.25,119.7 r0 bottom
C20_R51 "1uF" C0201 90.25,131.5 r0 bottom
C20_R52 "1uF" C0201 109.25,131.5 r0 bottom
C20_R53 "1uF" C0201 128.25,131.5 r0 bottom
C20_R54 "1uF" C0201 147.25,131.5 r0 bottom
C21_R11 "1uF" C0201 89.13,85.22 r270 bottom
C21_R12 "1uF" C0201 108.13,85.22 r270 bottom
C21_R13 "1uF" C0201 127.13,85.22 r270 bottom
C21_R14 "1uF" C0201 146.13,85.22 r270 bottom
C21_R21 "1uF" C0201 89.13,97.02 r270 bottom
C21_R22 "1uF" C0201 108.13,97.02 r270 bottom
C21_R23 "1uF" C0201 127.13,97.02 r270 bottom
C21_R24 "1uF" C0201 146.13,97.02 r270 bottom
C21_R31 "1uF" C0201 89.13,108.82 r270 bottom
C21_R32 "1uF" C0201 108.13,108.82 r270 bottom
C21_R33 "1uF" C0201 127.13,108.82 r270 bottom
C21_R34 "1uF" C0201 146.13,108.82 r270 bottom
C21_R41 "1uF" C0201 89.13,120.62 r270 bottom
C21_R42 "1uF" C0201 108.13,120.62 r270 bottom
C21_R43 "1uF" C0201 127.13,120.62 r270 bottom
C21_R44 "1uF" C0201 146.13,120.62 r270 bottom
C21_R51 "1uF" C0201 89.13,132.42 r270 bottom
C21_R52 "1uF" C0201 108.13,132.42 r270 bottom
C21_R53 "1uF" C0201 127.13,132.42 r270 bottom
C21_R54 "1uF" C0201 146.13,132.42 r270 bottom
C30_R11 "10uF" C0402 91.05,83.89 r180 top
C30_R12 "10uF" C0402 110.05,83.89 r180 top
C30_R13 "10uF" C0402 129.05,83.89 r180 top
C30_R14 "10uF" C0402 148.05,83.89 r180 top
C30_R21 "10uF" C0402 91.05,95.69 r180 top
C30_R22 "10uF" C0402 110.05,95.69 r180 top
C30_R23 "10uF" C0402 129.05,95.69 r180 top
C30_R24 "10uF" C0402 148.05,95.69 r180 top
C30_R31 "10uF" C0402 91.05,107.49 r180 top
C30_R32 "10uF" C0402 110.05,107.49 r180 top
C30_R33 "10uF" C0402 129.05,107.49 r180 top
C30_R34 "10uF" C0402 148.05,107.49 r180 top
C30_R41 "10uF" C0402 91.05,119.29 r180 top
C30_R42 "10uF" C0402 110.05,119.29 r180 top
C30_R43 "10uF" C0402 129.05,119.29 r180 top
C30_R44 "10uF" C0402 148.05,119.29 r180 top
C30_R51 "10uF" C0402 91.05,131.09 r180 top
C30_R52 "10uF" C0402 110.05,131.09 r180 top
C30_R53 "10uF" C0402 129.05,131.09 r180 top
C30_R54 "10uF" C0402 148.05,131.09 r180 top
C31_R11 "1uF" C0201 93.3,90.4 r90 top
C31_R12 "1uF" C0201 112.3,90.4 r90 top
C31_R13 "1uF" C0201 131.3,90.4 r90 top
C31_R14 "1uF" C0201 150.3,90.4 r90 top
C31_R21 "1uF" C0201 93.3,102.2 r90 top
C31_R22 "1uF" C0201 112.3,102.2 r90 top
C31_R23 "1uF" C0201 131.3,102.2 r90 top
C31_R24 "1uF" C0201 150.3,102.2 r90 top
C31_R31 "1uF" C0201 93.3,114 r90 top
C31_R32 "1uF" C0201 112.3,114 r90 top
C31_R33 "1uF" C0201 131.3,114 r90 top
C31_R34 "1uF" C0201 150.3,114 r90 top
C31_R41 "1uF" C0201 93.3,125.8 r90 top
C31_R42 "1uF" C0201 112.3,125.8 r90 top
C31_R43 "1uF" C0201 131.3,125.8 r90 top
C31_R44 "1uF" C0201 150.3,125.8 r90 top
C31_R51 "1uF" C0201 93.3,137.6 r90 top
C31_R52 "1uF" C0201 112.3,137.6 r90 top
C31_R53 "1uF" C0201 131.3,137.6 r90 top
C31_R54 "1uF" C0201 150.3,137.6 r90 top
C32_R11 "1uF" C0201 90.57,84.85 r180 bottom
C32_R12 "1uF" C0201 109.57,84.85 r180 bottom
C32_R13 "1uF" C0201 128.57,84.85 r180 bottom
C32_R14 "1uF" C0201 147.57,84.85 r180 bottom
C32_R21 "1uF" C0201 90.57,96.65 r180 bottom
C32_R22 "1uF" C0201 109.57,96.65 r180 bottom
C32_R23 "1uF" C0201 128.57,96.65 r180 bottom
C32_R24 "1uF" C0201 147.57,96.65 r180 bottom
C32_R31 "1uF" C0201 90.57,108.45 r180 bottom
C32_R32 "1uF" C0201 109.57,108.45 r180 bottom
C32_R33 "1uF" C0201 128.57,108.45 r180 bottom
C32_R34 "1uF" C0201 147.57,108.45 r180 bottom
C32_R41 "1uF" C0201 90.57,120.25 r180 bottom
C32_R42 "1uF" C0201 109.57,120.25 r180 bottom
C32_R43 "1uF" C0201 128.57,120.25 r180 bottom
C32_R44 "1uF" C0201 147.57,120.25 r180 bottom
C32_R51 "1uF" C0201 90.57,132.05 r180 bottom
C32_R52 "1uF" C0201 109.57,132.05 r180 bottom
C32_R53 "1uF" C0201 128.57,132.05 r180 bottom
C32_R54 "1uF" C0201 147.57,132.05 r180 bottom
C40_R11 "100pF" C0201 93.411,88.229 r270 top
C40_R12 "100pF" C0201 112.411,88.229 r270 top
C40_R13 "100pF" C0201 131.411,88.229 r270 top
C40_R14 "100pF" C0201 150.411,88.229 r270 top
C40_R21 "100pF" C0201 93.411,100.029 r270 top
C40_R22 "100pF" C0201 112.411,100.029 r270 top
C40_R23 "100pF" C0201 131.411,100.029 r270 top
C40_R24 "100pF" C0201 150.411,100.029 r270 top
C40_R31 "100pF" C0201 93.411,111.829 r270 top
C40_R32 "100pF" C0201 112.411,111.829 r270 top
C40_R33 "100pF" C0201 131.411,111.829 r270 top
C40_R34 "100pF" C0201 150.411,111.829 r270 top
C40_R41 "100pF" C0201 93.411,123.629 r270 top
C40_R42 "100pF" C0201 112.411,123.629 r270 top
C40_R43 "100pF" C0201 131.411,123.629 r270 top
C40_R44 "100pF" C0201 150.411,123.629 r270 top
C40_R51 "100pF" C0201 93.411,135.429 r270 top
C40_R52 "100pF" C0201 112.411,135.429 r270 top
C40_R53 "100pF" C0201 131.411,135.429 r270 top
C40_R54 "100pF" C0201 150.411,135.429 r270 top
C42_R11 "100pF" C0201 92.53,89.511 r90 top
C42_R12 "100pF" C0201 111.53,89.511 r90 top
C42_R13 "100pF" C0201 130.53,89.511 r90 top
C42_R14 "100pF" C0201 149.53,89.511 r90 top
C42_R21 "100pF" C0201 92.53,101.311 r90 top
C42_R22 "100pF" C0201 111.53,101.311 r90 top
C42_R23 "100pF" C0201 130.53,101.311 r90 top
C42_R24 "100pF" C0201 149.53,101.311 r90 top
C42_R31 "100pF" C0201 92.53,113.111 r90 top
C42_R32 "100pF" C0201 111.53,113.111 r90 top
C42_R33 "100pF" C0201 130.53,113.111 r90 top
C42_R34 "100pF" C0201 149.53,113.111 r90 top
C42_R41 "100pF" C0201 92.53,124.911 r90 top
C42_R42 "100pF" C0201 111.53,124.911 r90 top
C42_R43 "100pF" C0201 130.53,124.911 r90 top
C42_R44 "100pF" C0201 149.53,124.911 r90 top
C42_R51 "100pF" C0201 92.53,136.711 r90 top
C42_R52 "100pF" C0201 111.53,136.711 r90 top
C42_R53 "100pF" C0201 130.53,136.711 r90 top
C42_R54 "100pF" C0201 149.53,136.711 r90 top
C50_P11 "10uF" C0402 85.051,90.456 r90 top
C50_P12 "10uF" C0402 104.051,90.456 r90 top
C50_P13 "10uF" C0402 123.051,90.456 r90 top
C50_P14 "10uF" C0402 142.051,90.456 r90 top
C50_P21 "10uF" C0402 85.051,102.256 r90 top
C50_P22 "10uF" C0402 104.051,102.256 r90 top
C50_P23 "10uF" C0402 123.051,102.256 r90 top
C50_P24 "10uF" C0402 142.051,102.256 r90 top
C50_P31 "10uF" C0402 85.051,114.056 r90 top
C50_P32 "10uF" C0402 104.051,114.056 r90 top
C50_P33 "10uF" C0402 123.051,114.056 r90 top
C50_P34 "10uF" C0402 142.051,114.056 r90 top
C50_P41 "10uF" C0402 85.051,125.856 r90 top
C50_P42 "10uF" C0402 104.051,125.856 r90 top
C50_P43 "10uF" C0402 123.051,125.856 r90 top
C50_P44 "10uF" C0402 142.051,125.856 r90 top
C50_P51 "10uF" C0402 85.051,137.656 r90 top
C50_P52 "10uF" C0402 104.051,137.656 r90 top
C50_P53 "10uF" C0402 123.051,137.656 r90 top
C50_P54 "10uF" C0402 142.051,137.656 r90 top
C51_P11 "22uF" C0402 84.53,90.05 r90 bottom
C51_P12 "22uF" C0402 103.53,90.05 r90 bottom
C51_P13 "22uF" C0402 122.53,90.05 r90 bottom
C51_P14 "22uF" C0402 141.53,90.05 r90 bottom
C51_P21 "22uF" C0402 84.53,101.85 r90 bottom
C51_P22 "22uF" C0402 103.53,101.85 r90 bottom
C51_P23 "22uF" C0402 122.53,101.85 r90 bottom
C51_P24 "22uF" C0402 141.53,101.85 r90 bottom
C51_P31 "22uF" C0402 84.53,113.65 r90 bottom
C51_P32 "22uF" C0402 103.53,113.65 r90 bottom
C51_P33 "22uF" C0402 122.53,113.65 r90 bottom
C51_P34 "22uF" C0402 141.53,113.65 r90 bottom
C51_P41 "22uF" C0402 84.53,125.45 r90 bottom
C51_P42 "22uF" C0402 103.53,125.45 r90 bottom
C51_P43 "22uF" C0402 122.53,125.45 r90 bottom
C51_P44 "22uF" C0402 141.53,125.45 r90 bottom
C51_P51 "22uF" C0402 84.53,137.25 r90 bottom
C51_P52 "22uF" C0402 103.53,137.25 r90 bottom
C51_P53 "22uF" C0402 122.53,137.25 r90 bottom
C51_P54 "22uF" C0402 141.53,137.25 r90 bottom
C52_P11 "10uF" C0402 86.285,84.78 r270 bottom
C52_P12 "10uF" C0402 105.285,84.78 r270 bottom
C52_P13 "10uF" C0402 124.285,84.78 r270 bottom
C52_P14 "10uF" C0402 143.285,84.78 r270 bottom
C52_P21 "10uF" C0402 86.285,96.58 r270 bottom
C52_P22 "10uF" C0402 105.285,96.58 r270 bottom
C52_P23 "10uF" C0402 124.285,96.58 r270 bottom
C52_P24 "10uF" C0402 143.285,96.58 r270 bottom
C52_P31 "10uF" C0402 86.285,108.38 r270 bottom
C52_P32 "10uF" C0402 105.285,108.38 r270 bottom
C52_P33 "10uF" C0402 124.285,108.38 r270 bottom
C52_P34 "10uF" C0402 143.285,108.38 r270 bottom
C52_P41 "10uF" C0402 86.285,120.18 r270 bottom
C52_P42 "10uF" C0402 105.285,120.18 r270 bottom
C52_P43 "10uF" C0402 124.285,120.18 r270 bottom
C52_P44 "10uF" C0402 143.285,120.18 r270 bottom
C52_P51 "10uF" C0402 86.285,131.98 r270 bottom
C52_P52 "10uF" C0402 105.285,131.98 r270 bottom
C52_P53 "10uF" C0402 124.285,131.98 r270 bottom
C52_P54 "10uF" C0402 143.285,131.98 r270 bottom
C53_P11 "4.7uF" C0402 85.04,85.62 r270 bottom
C53_P12 "4.7uF" C0402 104.04,85.62 r270 bottom
C53_P13 "4.7uF" C0402 123.04,85.62 r270 bottom
C53_P14 "4.7uF" C0402 142.04,85.62 r270 bottom
C53_P21 "4.7uF" C0402 85.04,97.42 r270 bottom
C53_P22 "4.7uF" C0402 104.04,97.42 r270 bottom
C53_P23 "4.7uF" C0402 123.04,97.42 r270 bottom
C53_P24 "4.7uF" C0402 142.04,97.42 r270 bottom
C53_P31 "4.7uF" C0402 85.04,109.22 r270 bottom
C53_P32 "4.7uF" C0402 104.04,109.22 r270 bottom
C53_P33 "4.7uF" C0402 123.04,109.22 r270 bottom
C53_P34 "4.7uF" C0402 142.04,109.22 r270 bottom
C53_P41 "4.7uF" C0402 85.04,121.02 r270 bottom
C53_P42 "4.7uF" C0402 104.04,121.02 r270 bottom
C53_P43 "4.7uF" C0402 123.04,121.02 r270 bottom
C53_P44 "4.7uF" C0402 142.04,121.02 r270 bottom
C53_P51 "4.7uF" C0402 85.04,132.82 r270 bottom
C53_P52 "4.7uF" C0402 104.04,132.82 r270 bottom
C53_P53 "4.7uF" C0402 123.04,132.82 r270 bottom
C53_P54 "4.7uF" C0402 142.04,132.82 r270 bottom
C55_P11 "100nF" C0201 85.12,89.765 r270 bottom
C55_P12 "100nF" C0201 104.12,89.765 r270 bottom
C55_P13 "100nF" C0201 123.12,89.765 r270 bottom
C55_P14 "100nF" C0201 142.12,89.765 r270 bottom
C55_P21 "100nF" C0201 85.12,101.565 r270 bottom
C55_P22 "100nF" C0201 104.12,101.565 r270 bottom
C55_P23 "100nF" C0201 123.12,101.565 r270 bottom
C55_P24 "100nF" C0201 142.12,101.565 r270 bottom
C55_P31 "100nF" C0201 85.12,113.365 r270 bottom
C55_P32 "100nF" C0201 104.12,113.365 r270 bottom
C55_P33 "100nF" C0201 123.12,113.365 r270 bottom
C55_P34 "100nF" C0201 142.12,113.365 r270 bottom
C55_P41 "100nF" C0201 85.12,125.165 r270 bottom
C55_P42 "100nF" C0201 104.12,125.165 r270 bottom
C55_P43 "100nF" C0201 123.12,125.165 r270 bottom
C55_P44 "100nF" C0201 142.12,125.165 r270 bottom
C55_P51 "100nF" C0201 85.12,136.965 r270 bottom
C55_P52 "100nF" C0201 104.12,136.965 r270 bottom
C55_P53 "100nF" C0201 123.12,136.965 r270 bottom
C55_P54 "100nF" C0201 142.12,136.965 r270 bottom
C56_P11 "1uF" C0201 84.45,85.81 r270 bottom
C56_P12 "1uF" C0201 103.45,85.81 r270 bottom
C56_P13 "1uF" C0201 122.45,85.81 r270 bottom
C56_P14 "1uF" C0201 141.45,85.81 r270 bottom
C56_P21 "1uF" C0201 84.45,97.61 r270 bottom
C56_P22 "1uF" C0201 103.45,97.61 r270 bottom
C56_P23 "1uF" C0201 122.45,97.61 r270 bottom
C56_P24 "1uF" C0201 141.45,97.61 r270 bottom
C56_P31 "1uF" C0201 84.45,109.41 r270 bottom
C56_P32 "1uF" C0201 103.45,109.41 r270 bottom
C56_P33 "1uF" C0201 122.45,109.41 r270 bottom
C56_P34 "1uF" C0201 141.45,109.41 r270 bottom
C56_P41 "1uF" C0201 84.45,121.21 r270 bottom
C56_P42 "1uF" C0201 103.45,121.21 r270 bottom
C56_P43 "1uF" C0201 122.45,121.21 r270 bottom
C56_P44 "1uF" C0201 141.45,121.21 r270 bottom
C56_P51 "1uF" C0201 84.45,133.01 r270 bottom
C56_P52 "1uF" C0201 103.45,133.01 r270 bottom
C56_P53 "1uF" C0201 122.45,133.01 r270 bottom
C56_P54 "1uF" C0201 141.45,133.01 r270 bottom
C60_P11 "100nF" C0201 84.42,86.41 r0 top
C60_P12 "100nF" C0201 103.42,86.41 r0 top
C60_P13 "100nF" C0201 122.42,86.41 r0 top
C60_P14 "100nF" C0201 141.42,86.41 r0 top
C60_P21 "100nF" C0201 84.42,98.21 r0 top
C60_P22 "100nF" C0201 103.42,98.21 r0 top
C60_P23 "100nF" C0201 122.42,98.21 r0 top
C60_P24 "100nF" C0201 141.42,98.21 r0 top
C60_P31 "100nF" C0201 84.42,110.01 r0 top
C60_P32 "100nF" C0201 103.42,110.01 r0 top
C60_P33 "100nF" C0201 122.42,110.01 r0 top
C60_P34 "100nF" C0201 141.42,110.01 r0 top
C60_P41 "100nF" C0201 84.42,121.81 r0 top
C60_P42 "100nF" C0201 103.42,121.81 r0 top
C60_P43 "100nF" C0201 122.42,121.81 r0 top
C60_P44 "100nF" C0201 141.42,121.81 r0 top
C60_P51 "100nF" C0201 84.42,133.61 r0 top
C60_P52 "100nF" C0201 103.42,133.61 r0 top
C60_P53 "100nF" C0201 122.42,133.61 r0 top
C60_P54 "100nF" C0201 141.42,133.61 r0 top
C63_P11 "1uF" C0201 83.78,88.84 r270 bottom
C63_P12 "1uF" C0201 102.78,88.84 r270 bottom
C63_P13 "1uF" C0201 121.78,88.84 r270 bottom
C63_P14 "1uF" C0201 140.78,88.84 r270 bottom
C63_P21 "1uF" C0201 83.78,100.64 r270 bottom
C63_P22 "1uF" C0201 102.78,100.64 r270 bottom
C63_P23 "1uF" C0201 121.78,100.64 r270 bottom
C63_P24 "1uF" C0201 140.78,100.64 r270 bottom
C63_P31 "1uF" C0201 83.78,112.44 r270 bottom
C63_P32 "1uF" C0201 102.78,112.44 r270 bottom
C63_P33 "1uF" C0201 121.78,112.44 r270 bottom
C63_P34 "1uF" C0201 140.78,112.44 r270 bottom
C63_P41 "1uF" C0201 83.78,124.24 r270 bottom
C63_P42 "1uF" C0201 102.78,124.24 r270 bottom
C63_P43 "1uF" C0201 121.78,124.24 r270 bottom
C63_P44 "1uF" C0201 140.78,124.24 r270 bottom
C63_P51 "1uF" C0201 83.78,136.04 r270 bottom
C63_P52 "1uF" C0201 102.78,136.04 r270 bottom
C63_P53 "1uF" C0201 121.78,136.04 r270 bottom
C63_P54 "1uF" C0201 140.78,136.04 r270 bottom
D10_P11 "ESD5V3U04-0201" X3-DFN0603-2_L0.6-W0.3-RD 85.05,88.85 r90 bottom
D10_P12 "ESD5V3U04-0201" X3-DFN0603-2_L0.6-W0.3-RD 104.05,88.85 r90 bottom
D10_P13 "ESD5V3U04-0201" X3-DFN0603-2_L0.6-W0.3-RD 123.05,88.85 r90 bottom
D10_P14 "ESD5V3U04-0201" X3-DFN0603-2_L0.6-W0.3-RD 142.05,88.85 r90 bottom
D10_P21 "ESD5V3U04-0201" X3-DFN0603-2_L0.6-W0.3-RD 85.05,100.65 r90 bottom
D10_P22 "ESD5V3U04-0201" X3-DFN0603-2_L0.6-W0.3-RD 104.05,100.65 r90 bottom
D10_P23 "ESD5V3U04-0201" X3-DFN0603-2_L0.6-W0.3-RD 123.05,100.65 r90 bottom
D10_P24 "ESD5V3U04-0201" X3-DFN0603-2_L0.6-W0.3-RD 142.05,100.65 r90 bottom
D10_P31 "ESD5V3U04-0201" X3-DFN0603-2_L0.6-W0.3-RD 85.05,112.45 r90 bottom
D10_P32 "ESD5V3U04-0201" X3-DFN0603-2_L0.6-W0.3-RD 104.05,112.45 r90 bottom
D10_P33 "ESD5V3U04-0201" X3-DFN0603-2_L0.6-W0.3-RD 123.05,112.45 r90 bottom
D10_P34 "ESD5V3U04-0201" X3-DFN0603-2_L0.6-W0.3-RD 142.05,112.45 r90 bottom
D10_P41 "ESD5V3U04-0201" X3-DFN0603-2_L0.6-W0.3-RD 85.05,124.25 r90 bottom
D10_P42 "ESD5V3U04-0201" X3-DFN0603-2_L0.6-W0.3-RD 104.05,124.25 r90 bottom
D10_P43 "ESD5V3U04-0201" X3-DFN0603-2_L0.6-W0.3-RD 123.05,124.25 r90 bottom
D10_P44 "ESD5V3U04-0201" X3-DFN0603-2_L0.6-W0.3-RD 142.05,124.25 r90 bottom
D10_P51 "ESD5V3U04-0201" X3-DFN0603-2_L0.6-W0.3-RD 85.05,136.05 r90 bottom
D10_P52 "ESD5V3U04-0201" X3-DFN0603-2_L0.6-W0.3-RD 104.05,136.05 r90 bottom
D10_P53 "ESD5V3U04-0201" X3-DFN0603-2_L0.6-W0.3-RD 123.05,136.05 r90 bottom
D10_P54 "ESD5V3U04-0201" X3-DFN0603-2_L0.6-W0.3-RD 142.05,136.05 r90 bottom
D12_P11 "ESD5V3U04-0201" X3-DFN0603-2_L0.6-W0.3-RD 86.3,84.77 r90 top
D12_P12 "ESD5V3U04-0201" X3-DFN0603-2_L0.6-W0.3-RD 105.3,84.77 r90 top
D12_P13 "ESD5V3U04-0201" X3-DFN0603-2_L0.6-W0.3-RD 124.3,84.77 r90 top
D12_P14 "ESD5V3U04-0201" X3-DFN0603-2_L0.6-W0.3-RD 143.3,84.77 r90 top
D12_P21 "ESD5V3U04-0201" X3-DFN0603-2_L0.6-W0.3-RD 86.3,96.57 r90 top
D12_P22 "ESD5V3U04-0201" X3-DFN0603-2_L0.6-W0.3-RD 105.3,96.57 r90 top
D12_P23 "ESD5V3U04-0201" X3-DFN0603-2_L0.6-W0.3-RD 124.3,96.57 r90 top
D12_P24 "ESD5V3U04-0201" X3-DFN0603-2_L0.6-W0.3-RD 143.3,96.57 r90 top
D12_P31 "ESD5V3U04-0201" X3-DFN0603-2_L0.6-W0.3-RD 86.3,108.37 r90 top
D12_P32 "ESD5V3U04-0201" X3-DFN0603-2_L0.6-W0.3-RD 105.3,108.37 r90 top
D12_P33 "ESD5V3U04-0201" X3-DFN0603-2_L0.6-W0.3-RD 124.3,108.37 r90 top
D12_P34 "ESD5V3U04-0201" X3-DFN0603-2_L0.6-W0.3-RD 143.3,108.37 r90 top
D12_P41 "ESD5V3U04-0201" X3-DFN0603-2_L0.6-W0.3-RD 86.3,120.17 r90 top
D12_P42 "ESD5V3U04-0201" X3-DFN0603-2_L0.6-W0.3-RD 105.3,120.17 r90 top
D12_P43 "ESD5V3U04-0201" X3-DFN0603-2_L0.6-W0.3-RD 124.3,120.17 r90 top
D12_P44 "ESD5V3U04-0201" X3-DFN0603-2_L0.6-W0.3-RD 143.3,120.17 r90 top
D12_P51 "ESD5V3U04-0201" X3-DFN0603-2_L0.6-W0.3-RD 86.3,131.97 r90 top
D12_P52 "ESD5V3U04-0201" X3-DFN0603-2_L0.6-W0.3-RD 105.3,131.97 r90 top
D12_P53 "ESD5V3U04-0201" X3-DFN0603-2_L0.6-W0.3-RD 124.3,131.97 r90 top
D12_P54 "ESD5V3U04-0201" X3-DFN0603-2_L0.6-W0.3-RD 143.3,131.97 r90 top
D13_P11 "ESD5V3U04-0201" X3-DFN0603-2_L0.6-W0.3-RD 86.1,91.5 r90 top
D13_P12 "ESD5V3U04-0201" X3-DFN0603-2_L0.6-W0.3-RD 105.1,91.5 r90 top
D13_P13 "ESD5V3U04-0201" X3-DFN0603-2_L0.6-W0.3-RD 124.1,91.5 r90 top
D13_P14 "ESD5V3U04-0201" X3-DFN0603-2_L0.6-W0.3-RD 143.1,91.5 r90 top
D13_P21 "ESD5V3U04-0201" X3-DFN0603-2_L0.6-W0.3-RD 86.1,103.3 r90 top
D13_P22 "ESD5V3U04-0201" X3-DFN0603-2_L0.6-W0.3-RD 105.1,103.3 r90 top
D13_P23 "ESD5V3U04-0201" X3-DFN0603-2_L0.6-W0.3-RD 124.1,103.3 r90 top
D13_P24 "ESD5V3U04-0201" X3-DFN0603-2_L0.6-W0.3-RD 143.1,103.3 r90 top
D13_P31 "ESD5V3U04-0201" X3-DFN0603-2_L0.6-W0.3-RD 86.1,115.1 r90 top
D13_P32 "ESD5V3U04-0201" X3-DFN0603-2_L0.6-W0.3-RD 105.1,115.1 r90 top
D13_P33 "ESD5V3U04-0201" X3-DFN0603-2_L0.6-W0.3-RD 124.1,115.1 r90 top
D13_P34 "ESD5V3U04-0201" X3-DFN0603-2_L0.6-W0.3-RD 143.1,115.1 r90 top
D13_P41 "ESD5V3U04-0201" X3-DFN0603-2_L0.6-W0.3-RD 86.1,126.9 r90 top
D13_P42 "ESD5V3U04-0201" X3-DFN0603-2_L0.6-W0.3-RD 105.1,126.9 r90 top
D13_P43 "ESD5V3U04-0201" X3-DFN0603-2_L0.6-W0.3-RD 124.1,126.9 r90 top
D13_P44 "ESD5V3U04-0201" X3-DFN0603-2_L0.6-W0.3-RD 143.1,126.9 r90 top
D13_P51 "ESD5V3U04-0201" X3-DFN0603-2_L0.6-W0.3-RD 86.1,138.7 r90 top
D13_P52 "ESD5V3U04-0201" X3-DFN0603-2_L0.6-W0.3-RD 105.1,138.7 r90 top
D13_P53 "ESD5V3U04-0201" X3-DFN0603-2_L0.6-W0.3-RD 124.1,138.7 r90 top
D13_P54 "ESD5V3U04-0201" X3-DFN0603-2_L0.6-W0.3-RD 143.1,138.7 r90 top
L1_R11 "10uH" L0603 90.1,84.7 r180 top
L1_R12 "10uH" L0603 109.1,84.7 r180 top
L1_R13 "10uH" L0603 128.1,84.7 r180 top
L1_R14 "10uH" L0603 147.1,84.7 r180 top
L1_R21 "10uH" L0603 90.1,96.5 r180 top
L1_R22 "10uH" L0603 109.1,96.5 r180 top
L1_R23 "10uH" L0603 128.1,96.5 r180 top
L1_R24 "10uH" L0603 147.1,96.5 r180 top
L1_R31 "10uH" L0603 90.1,108.3 r180 top
L1_R32 "10uH" L0603 109.1,108.3 r180 top
L1_R33 "10uH" L0603 128.1,108.3 r180 top
L1_R34 "10uH" L0603 147.1,108.3 r180 top
L1_R41 "10uH" L0603 90.1,120.1 r180 top
L1_R42 "10uH" L0603 109.1,120.1 r180 top
L1_R43 "10uH" L0603 128.1,120.1 r180 top
L1_R44 "10uH" L0603 147.1,120.1 r180 top
L1_R51 "10uH" L0603 90.1,131.9 r180 top
L1_R52 "10uH" L0603 109.1,131.9 r180 top
L1_R53 "10uH" L0603 128.1,131.9 r180 top
L1_R54 "10uH" L0603 147.1,131.9 r180 top
L2_R11 "15nH" L0402-R-RD 89.9,85.6 r0 top
L2_R12 "15nH" L0402-R-RD 108.9,85.6 r0 top
L2_R13 "15nH" L0402-R-RD 127.9,85.6 r0 top
L2_R14 "15nH" L0402-R-RD 146.9,85.6 r0 top
L2_R21 "15nH" L0402-R-RD 89.9,97.4 r0 top
L2_R22 "15nH" L0402-R-RD 108.9,97.4 r0 top
L2_R23 "15nH" L0402-R-RD 127.9,97.4 r0 top
L2_R24 "15nH" L0402-R-RD 146.9,97.4 r0 top
L2_R31 "15nH" L0402-R-RD 89.9,109.2 r0 top
L2_R32 "15nH" L0402-R-RD 108.9,109.2 r0 top
L2_R33 "15nH" L0402-R-RD 127.9,109.2 r0 top
L2_R34 "15nH" L0402-R-RD 146.9,109.2 r0 top
L2_R41 "15nH" L0402-R-RD 89.9,121 r0 top
L2_R42 "15nH" L0402-R-RD 108.9,121 r0 top
L2_R43 "15nH" L0402-R-RD 127.9,121 r0 top
L2_R44 "15nH" L0402-R-RD 146.9,121 r0 top
L2_R51 "15nH" L0402-R-RD 89.9,132.8 r0 top
L2_R52 "15nH" L0402-R-RD 108.9,132.8 r0 top
L2_R53 "15nH" L0402-R-RD 127.9,132.8 r0 top
L2_R54 "15nH" L0402-R-RD 146.9,132.8 r0 top
L3_R11 "3.3nH" L0201-RD 92.53,88.488 r90 top
L3_R12 "3.3nH" L0201-RD 111.53,88.488 r90 top
L3_R13 "3.3nH" L0201-RD 130.53,88.488 r90 top
L3_R14 "3.3nH" L0201-RD 149.53,88.488 r90 top
L3_R21 "3.3nH" L0201-RD 92.53,100.288 r90 top
L3_R22 "3.3nH" L0201-RD 111.53,100.288 r90 top
L3_R23 "3.3nH" L0201-RD 130.53,100.288 r90 top
L3_R24 "3.3nH" L0201-RD 149.53,100.288 r90 top
L3_R31 "3.3nH" L0201-RD 92.53,112.088 r90 top
L3_R32 "3.3nH" L0201-RD 111.53,112.088 r90 top
L3_R33 "3.3nH" L0201-RD 130.53,112.088 r90 top
L3_R34 "3.3nH" L0201-RD 149.53,112.088 r90 top
L3_R41 "3.3nH" L0201-RD 92.53,123.888 r90 top
L3_R42 "3.3nH" L0201-RD 111.53,123.888 r90 top
L3_R43 "3.3nH" L0201-RD 130.53,123.888 r90 top
L3_R44 "3.3nH" L0201-RD 149.53,123.888 r90 top
L3_R51 "3.3nH" L0201-RD 92.53,135.688 r90 top
L3_R52 "3.3nH" L0201-RD 111.53,135.688 r90 top
L3_R53 "3.3nH" L0201-RD 130.53,135.688 r90 top
L3_R54 "3.3nH" L0201-RD 149.53,135.688 r90 top
R1_R11 "4.7kΩ" R0201 89.2,91.25 r90 bottom
R1_R12 "4.7kΩ" R0201 108.2,91.25 r90 bottom
R1_R13 "4.7kΩ" R0201 127.2,91.25 r90 bottom
R1_R14 "4.7kΩ" R0201 146.2,91.25 r90 bottom
R1_R21 "4.7kΩ" R0201 89.2,103.05 r90 bottom
R1_R22 "4.7kΩ" R0201 108.2,103.05 r90 bottom
R1_R23 "4.7kΩ" R0201 127.2,103.05 r90 bottom
R1_R24 "4.7kΩ" R0201 146.2,103.05 r90 bottom
R1_R31 "4.7kΩ" R0201 89.2,114.85 r90 bottom
R1_R32 "4.7kΩ" R0201 108.2,114.85 r90 bottom
R1_R33 "4.7kΩ" R0201 127.2,114.85 r90 bottom
R1_R34 "4.7kΩ" R0201 146.2,114.85 r90 bottom
R1_R41 "4.7kΩ" R0201 89.2,126.65 r90 bottom
R1_R42 "4.7kΩ" R0201 108.2,126.65 r90 bottom
R1_R43 "4.7kΩ" R0201 127.2,126.65 r90 bottom
R1_R44 "4.7kΩ" R0201 146.2,126.65 r90 bottom
R1_R51 "4.7kΩ" R0201 89.2,138.45 r90 bottom
R1_R52 "4.7kΩ" R0201 108.2,138.45 r90 bottom
R1_R53 "4.7kΩ" R0201 127.2,138.45 r90 bottom
R1_R54 "4.7kΩ" R0201 146.2,138.45 r90 bottom
R2_R11 "4.7kΩ" R0201 91.15,92.05 r180 bottom
R2_R12 "4.7kΩ" R0201 110.15,92.05 r180 bottom
R2_R13 "4.7kΩ" R0201 129.15,92.05 r180 bottom
R2_R14 "4.7kΩ" R0201 148.15,92.05 r180 bottom
R2_R21 "4.7kΩ" R0201 91.15,103.85 r180 bottom
R2_R22 "4.7kΩ" R0201 110.15,103.85 r180 bottom
R2_R23 "4.7kΩ" R0201 129.15,103.85 r180 bottom
R2_R24 "4.7kΩ" R0201 148.15,103.85 r180 bottom
R2_R31 "4.7kΩ" R0201 91.15,115.65 r180 bottom
R2_R32 "4.7kΩ" R0201 110.15,115.65 r180 bottom
R2_R33 "4.7kΩ" R0201 129.15,115.65 r180 bottom
R2_R34 "4.7kΩ" R0201 148.15,115.65 r180 bottom
R2_R41 "4.7kΩ" R0201 91.15,127.45 r180 bottom
R2_R42 "4.7kΩ" R0201 110.15,127.45 r180 bottom
R2_R43 "4.7kΩ" R0201 129.15,127.45 r180 bottom
R2_R44 "4.7kΩ" R0201 148.15,127.45 r180 bottom
R2_R51 "4.7kΩ" R0201 91.15,139.25 r180 bottom
R2_R52 "4.7kΩ" R0201 110.15,139.25 r180 bottom
R2_R53 "4.7kΩ" R0201 129.15,139.25 r180 bottom
R2_R54 "4.7kΩ" R0201 148.15,139.25 r180 bottom
R3_R11 "100kΩ" R0201 89.599,91.24 r270 top
R3_R12 "100kΩ" R0201 108.599,91.24 r270 top
R3_R13 "100kΩ" R0201 127.599,91.24 r270 top
R3_R14 "100kΩ" R0201 146.599,91.24 r270 top
R3_R21 "100kΩ" R0201 89.599,103.04 r270 top
R3_R22 "100kΩ" R0201 108.599,103.04 r270 top
R3_R23 "100kΩ" R0201 127.599,103.04 r270 top
R3_R24 "100kΩ" R0201 146.599,103.04 r270 top
R3_R31 "100kΩ" R0201 89.599,114.84 r270 top
R3_R32 "100kΩ" R0201 108.599,114.84 r270 top
R3_R33 "100kΩ" R0201 127.599,114.84 r270 top
R3_R34 "100kΩ" R0201 146.599,114.84 r270 top
R3_R41 "100kΩ" R0201 89.599,126.64 r270 top
R3_R42 "100kΩ" R0201 108.599,126.64 r270 top
R3_R43 "100kΩ" R0201 127.599,126.64 r270 top
R3_R44 "100kΩ" R0201 146.599,126.64 r270 top
R3_R51 "100kΩ" R0201 89.599,138.44 r270 top
R3_R52 "100kΩ" R0201 108.599,138.44 r270 top
R3_R53 "100kΩ" R0201 127.599,138.44 r270 top
R3_R54 "100kΩ" R0201 146.599,138.44 r270 top
R5_R11 "1MΩ" R0201 93.1,84.9 r180 bottom
R5_R12 "1MΩ" R0201 112.1,84.9 r180 bottom
R5_R13 "1MΩ" R0201 131.1,84.9 r180 bottom
R5_R14 "1MΩ" R0201 150.1,84.9 r180 bottom
R5_R21 "1MΩ" R0201 93.1,96.7 r180 bottom
R5_R22 "1MΩ" R0201 112.1,96.7 r180 bottom
R5_R23 "1MΩ" R0201 131.1,96.7 r180 bottom
R5_R24 "1MΩ" R0201 150.1,96.7 r180 bottom
R5_R31 "1MΩ" R0201 93.1,108.5 r180 bottom
R5_R32 "1MΩ" R0201 112.1,108.5 r180 bottom
R5_R33 "1MΩ" R0201 131.1,108.5 r180 bottom
R5_R34 "1MΩ" R0201 150.1,108.5 r180 bottom
R5_R41 "1MΩ" R0201 93.1,120.3 r180 bottom
R5_R42 "1MΩ" R0201 112.1,120.3 r180 bottom
R5_R43 "1MΩ" R0201 131.1,120.3 r180 bottom
R5_R44 "1MΩ" R0201 150.1,120.3 r180 bottom
R5_R51 "1MΩ" R0201 93.1,132.1 r180 bottom
R5_R52 "1MΩ" R0201 112.1,132.1 r180 bottom
R5_R53 "1MΩ" R0201 131.1,132.1 r180 bottom
R5_R54 "1MΩ" R0201 150.1,132.1 r180 bottom
R10_R11 "10kΩ" R0201 91.2,91.5 r180 bottom
R10_R12 "10kΩ" R0201 110.2,91.5 r180 bottom
R10_R13 "10kΩ" R0201 129.2,91.5 r180 bottom
R10_R14 "10kΩ" R0201 148.2,91.5 r180 bottom
R10_R21 "10kΩ" R0201 91.2,103.3 r180 bottom
R10_R22 "10kΩ" R0201 110.2,103.3 r180 bottom
R10_R23 "10kΩ" R0201 129.2,103.3 r180 bottom
R10_R24 "10kΩ" R0201 148.2,103.3 r180 bottom
R10_R31 "10kΩ" R0201 91.2,115.1 r180 bottom
R10_R32 "10kΩ" R0201 110.2,115.1 r180 bottom
R10_R33 "10kΩ" R0201 129.2,115.1 r180 bottom
R10_R34 "10kΩ" R0201 148.2,115.1 r180 bottom
R10_R41 "10kΩ" R0201 91.2,126.9 r180 bottom
R10_R42 "10kΩ" R0201 110.2,126.9 r180 bottom
R10_R43 "10kΩ" R0201 129.2,126.9 r180 bottom
R10_R44 "10kΩ" R0201 148.2,126.9 r180 bottom
R10_R51 "10kΩ" R0201 91.2,138.7 r180 bottom
R10_R52 "10kΩ" R0201 110.2,138.7 r180 bottom
R10_R53 "10kΩ" R0201 129.2,138.7 r180 bottom
R10_R54 "10kΩ" R0201 148.2,138.7 r180 bottom
R11_R11 "10kΩ" R0201 92.5,90.7 r0 top
R11_R12 "10kΩ" R0201 111.5,90.7 r0 top
R11_R13 "10kΩ" R0201 130.5,90.7 r0 top
R11_R14 "10kΩ" R0201 149.5,90.7 r0 top
R11_R21 "10kΩ" R0201 92.5,102.5 r0 top
R11_R22 "10kΩ" R0201 111.5,102.5 r0 top
R11_R23 "10kΩ" R0201 130.5,102.5 r0 top
R11_R24 "10kΩ" R0201 149.5,102.5 r0 top
R11_R31 "10kΩ" R0201 92.5,114.3 r0 top
R11_R32 "10kΩ" R0201 111.5,114.3 r0 top
R11_R33 "10kΩ" R0201 130.5,114.3 r0 top
R11_R34 "10kΩ" R0201 149.5,114.3 r0 top
R11_R41 "10kΩ" R0201 92.5,126.1 r0 top
R11_R42 "10kΩ" R0201 111.5,126.1 r0 top
R11_R43 "10kΩ" R0201 130.5,126.1 r0 top
R11_R44 "10kΩ" R0201 149.5,126.1 r0 top
R11_R51 "10kΩ" R0201 92.5,137.9 r0 top
R11_R52 "10kΩ" R0201 111.5,137.9 r0 top
R11_R53 "10kΩ" R0201 130.5,137.9 r0 top
R11_R54 "10kΩ" R0201 149.5,137.9 r0 top
R40_R11 "2.2MΩ" R0201 91.95,84.75 r180 bottom
R40_R12 "2.2MΩ" R0201 110.95,84.75 r180 bottom
R40_R13 "2.2MΩ" R0201 129.95,84.75 r180 bottom
R40_R14 "2.2MΩ" R0201 148.95,84.75 r180 bottom
R40_R21 "2.2MΩ" R0201 91.95,96.55 r180 bottom
R40_R22 "2.2MΩ" R0201 110.95,96.55 r180 bottom
R40_R23 "2.2MΩ" R0201 129.95,96.55 r180 bottom
R40_R24 "2.2MΩ" R0201 148.95,96.55 r180 bottom
R40_R31 "2.2MΩ" R0201 91.95,108.35 r180 bottom
R40_R32 "2.2MΩ" R0201 110.95,108.35 r180 bottom
R40_R33 "2.2MΩ" R0201 129.95,108.35 r180 bottom
R40_R34 "2.2MΩ" R0201 148.95,108.35 r180 bottom
R40_R41 "2.2MΩ" R0201 91.95,120.15 r180 bottom
R40_R42 "2.2MΩ" R0201 110.95,120.15 r180 bottom
R40_R43 "2.2MΩ" R0201 129.95,120.15 r180 bottom
R40_R44 "2.2MΩ" R0201 148.95,120.15 r180 bottom
R40_R51 "2.2MΩ" R0201 91.95,131.95 r180 bottom
R40_R52 "2.2MΩ" R0201 110.95,131.95 r180 bottom
R40_R53 "2.2MΩ" R0201 129.95,131.95 r180 bottom
R40_R54 "2.2MΩ" R0201 148.95,131.95 r180 bottom
R41_R11 "1MΩ" R0201 91.35,84.2 r180 bottom
R41_R12 "1MΩ" R0201 110.35,84.2 r180 bottom
R41_R13 "1MΩ" R0201 129.35,84.2 r180 bottom
R41_R14 "1MΩ" R0201 148.35,84.2 r180 bottom
R41_R21 "1MΩ" R0201 91.35,96 r180 bottom
R41_R22 "1MΩ" R0201 110.35,96 r180 bottom
R41_R23 "1MΩ" R0201 129.35,96 r180 bottom
R41_R24 "1MΩ" R0201 148.35,96 r180 bottom
R41_R31 "1MΩ" R0201 91.35,107.8 r180 bottom
R41_R32 "1MΩ" R0201 110.35,107.8 r180 bottom
R41_R33 "1MΩ" R0201 129.35,107.8 r180 bottom
R41_R34 "1MΩ" R0201 148.35,107.8 r180 bottom
R41_R41 "1MΩ" R0201 91.35,119.6 r180 bottom
R41_R42 "1MΩ" R0201 110.35,119.6 r180 bottom
R41_R43 "1MΩ" R0201 129.35,119.6 r180 bottom
R41_R44 "1MΩ" R0201 148.35,119.6 r180 bottom
R41_R51 "1MΩ" R0201 91.35,131.4 r180 bottom
R41_R52 "1MΩ" R0201 110.35,131.4 r180 bottom
R41_R53 "1MΩ" R0201 129.35,131.4 r180 bottom
R41_R54 "1MΩ" R0201 148.35,131.4 r180 bottom
R50_P11 "10kΩ" R0201 85.22,84.93 r180 top
R50_P12 "10kΩ" R0201 104.22,84.93 r180 top
R50_P13 "10kΩ" R0201 123.22,84.93 r180 top
R50_P14 "10kΩ" R0201 142.22,84.93 r180 top
R50_P21 "10kΩ" R0201 85.22,96.73 r180 top
R50_P22 "10kΩ" R0201 104.22,96.73 r180 top
R50_P23 "10kΩ" R0201 123.22,96.73 r180 top
R50_P24 "10kΩ" R0201 142.22,96.73 r180 top
R50_P31 "10kΩ" R0201 85.22,108.53 r180 top
R50_P32 "10kΩ" R0201 104.22,108.53 r180 top
R50_P33 "10kΩ" R0201 123.22,108.53 r180 top
R50_P34 "10kΩ" R0201 142.22,108.53 r180 top
R50_P41 "10kΩ" R0201 85.22,120.33 r180 top
R50_P42 "10kΩ" R0201 104.22,120.33 r180 top
R50_P43 "10kΩ" R0201 123.22,120.33 r180 top
R50_P44 "10kΩ" R0201 142.22,120.33 r180 top
R50_P51 "10kΩ" R0201 85.22,132.13 r180 top
R50_P52 "10kΩ" R0201 104.22,132.13 r180 top
R50_P53 "10kΩ" R0201 123.22,132.13 r180 top
R50_P54 "10kΩ" R0201 142.22,132.13 r180 top
R51_P11 "330Ω" R0201 85.85,85.75 r180 bottom
R51_P12 "330Ω" R0201 104.85,85.75 r180 bottom
R51_P13 "330Ω" R0201 123.85,85.75 r180 bottom
R51_P14 "330Ω" R0201 142.85,85.75 r180 bottom
R51_P21 "330Ω" R0201 85.85,97.55 r180 bottom
R51_P22 "330Ω" R0201 104.85,97.55 r180 bottom
R51_P23 "330Ω" R0201 123.85,97.55 r180 bottom
R51_P24 "330Ω" R0201 142.85,97.55 r180 bottom
R51_P31 "330Ω" R0201 85.85,109.35 r180 bottom
R51_P32 "330Ω" R0201 104.85,109.35 r180 bottom
R51_P33 "330Ω" R0201 123.85,109.35 r180 bottom
R51_P34 "330Ω" R0201 142.85,109.35 r180 bottom
R51_P41 "330Ω" R0201 85.85,121.15 r180 bottom
R51_P42 "330Ω" R0201 104.85,121.15 r180 bottom
R51_P43 "330Ω" R0201 123.85,121.15 r180 bottom
R51_P44 "330Ω" R0201 142.85,121.15 r180 bottom
R51_P51 "330Ω" R0201 85.85,132.95 r180 bottom
R51_P52 "330Ω" R0201 104.85,132.95 r180 bottom
R51_P53 "330Ω" R0201 123.85,132.95 r180 bottom
R51_P54 "330Ω" R0201 142.85,132.95 r180 bottom
TH1_R11 "NCP03XH103F05RL" R0201 90.05,92.15 r180 bottom
TH1_R12 "NCP03XH103F05RL" R0201 109.05,92.15 r180 bottom
TH1_R13 "NCP03XH103F05RL" R0201 128.05,92.15 r180 bottom
TH1_R14 "NCP03XH103F05RL" R0201 147.05,92.15 r180 bottom
TH1_R21 "NCP03XH103F05RL" R0201 90.05,103.95 r180 bottom
TH1_R22 "NCP03XH103F05RL" R0201 109.05,103.95 r180 bottom
TH1_R23 "NCP03XH103F05RL" R0201 128.05,103.95 r180 bottom
TH1_R24 "NCP03XH103F05RL" R0201 147.05,103.95 r180 bottom
TH1_R31 "NCP03XH103F05RL" R0201 90.05,115.75 r180 bottom
TH1_R32 "NCP03XH103F05RL" R0201 109.05,115.75 r180 bottom
TH1_R33 "NCP03XH103F05RL" R0201 128.05,115.75 r180 bottom
TH1_R34 "NCP03XH103F05RL" R0201 147.05,115.75 r180 bottom
TH1_R41 "NCP03XH103F05RL" R0201 90.05,127.55 r180 bottom
TH1_R42 "NCP03XH103F05RL" R0201 109.05,127.55 r180 bottom
TH1_R43 "NCP03XH103F05RL" R0201 128.05,127.55 r180 bottom
TH1_R44 "NCP03XH103F05RL" R0201 147.05,127.55 r180 bottom
TH1_R51 "NCP03XH103F05RL" R0201 90.05,139.35 r180 bottom
TH1_R52 "NCP03XH103F05RL" R0201 109.05,139.35 r180 bottom
TH1_R53 "NCP03XH103F05RL" R0201 128.05,139.35 r180 bottom
TH1_R54 "NCP03XH103F05RL" R0201 147.05,139.35 r180 bottom
TH4_R11 "NCP03XH103F05RL" R0201 92.75,91.36 r90 top
TH4_R12 "NCP03XH103F05RL" R0201 111.75,91.36 r90 top
TH4_R13 "NCP03XH103F05RL" R0201 130.75,91.36 r90 top
TH4_R14 "NCP03XH103F05RL" R0201 149.75,91.36 r90 top
TH4_R21 "NCP03XH103F05RL" R0201 92.75,103.16 r90 top
TH4_R22 "NCP03XH103F05RL" R0201 111.75,103.16 r90 top
TH4_R23 "NCP03XH103F05RL" R0201 130.75,103.16 r90 top
TH4_R24 "NCP03XH103F05RL" R0201 149.75,103.16 r90 top
TH4_R31 "NCP03XH103F05RL" R0201 92.75,114.96 r90 top
TH4_R32 "NCP03XH103F05RL" R0201 111.75,114.96 r90 top
TH4_R33 "NCP03XH103F05RL" R0201 130.75,114.96 r90 top
TH4_R34 "NCP03XH103F05RL" R0201 149.75,114.96 r90 top
TH4_R41 "NCP03XH103F05RL" R0201 92.75,126.76 r90 top
TH4_R42 "NCP03XH103F05RL" R0201 111.75,126.76 r90 top
TH4_R43 "NCP03XH103F05RL" R0201 130.75,126.76 r90 top
TH4_R44 "NCP03XH103F05RL" R0201 149.75,126.76 r90 top
TH4_R51 "NCP03XH103F05RL" R0201 92.75,138.56 r90 top
TH4_R52 "NCP03XH103F05RL" R0201 111.75,138.56 r90 top
TH4_R53 "NCP03XH103F05RL" R0201 130.75,138.56 r90 top
TH4_R54 "NCP03XH103F05RL" R0201 149.75,138.56 r90 top
TH5_P11 "NCP03XH103F05RL" R0201 84.799,85.501 r180 top
TH5_P12 "NCP03XH103F05RL" R0201 103.799,85.501 r180 top
TH5_P13 "NCP03XH103F05RL" R0201 122.799,85.501 r180 top
TH5_P14 "NCP03XH103F05RL" R0201 141.799,85.501 r180 top
TH5_P21 "NCP03XH103F05RL" R0201 84.799,97.301 r180 top
TH5_P22 "NCP03XH103F05RL" R0201 103.799,97.301 r180 top
TH5_P23 "NCP03XH103F05RL" R0201 122.799,97.301 r180 top
TH5_P24 "NCP03XH103F05RL" R0201 141.799,97.301 r180 top
TH5_P31 "NCP03XH103F05RL" R0201 84.799,109.101 r180 top
TH5_P32 "NCP03XH103F05RL" R0201 103.799,109.101 r180 top
TH5_P33 "NCP03XH103F05RL" R0201 122.799,109.101 r180 top
TH5_P34 "NCP03XH103F05RL" R0201 141.799,109.101 r180 top
TH5_P41 "NCP03XH103F05RL" R0201 84.799,120.901 r180 top
TH5_P42 "NCP03XH103F05RL" R0201 103.799,120.901 r180 top
TH5_P43 "NCP03XH103F05RL" R0201 122.799,120.901 r180 top
TH5_P44 "NCP03XH103F05RL" R0201 141.799,120.901 r180 top
TH5_P51 "NCP03XH103F05RL" R0201 84.799,132.701 r180 top
TH5_P52 "NCP03XH103F05RL" R0201 103.799,132.701 r180 top
TH5_P53 "NCP03XH103F05RL" R0201 122.799,132.701 r180 top
TH5_P54 "NCP03XH103F05RL" R0201 141.799,132.701 r180 top
U1_R11 "NRF52832-CIAA-G-R7" WLCSP-50_L3.2-W3.0-TL_NRF52832 90.3,88.75 r180 top
U1_R12 "NRF52832-CIAA-G-R7" WLCSP-50_L3.2-W3.0-TL_NRF52832 109.3,88.75 r180 top
U1_R13 "NRF52832-CIAA-G-R7" WLCSP-50_L3.2-W3.0-TL_NRF52832 128.3,88.75 r180 top
U1_R14 "NRF52832-CIAA-G-R7" WLCSP-50_L3.2-W3.0-TL_NRF52832 147.3,88.75 r180 top
U1_R21 "NRF52832-CIAA-G-R7" WLCSP-50_L3.2-W3.0-TL_NRF52832 90.3,100.55 r180 top
U1_R22 "NRF52832-CIAA-G-R7" WLCSP-50_L3.2-W3.0-TL_NRF52832 109.3,100.55 r180 top
U1_R23 "NRF52832-CIAA-G-R7" WLCSP-50_L3.2-W3.0-TL_NRF52832 128.3,100.55 r180 top
U1_R24 "NRF52832-CIAA-G-R7" WLCSP-50_L3.2-W3.0-TL_NRF52832 147.3,100.55 r180 top
U1_R31 "NRF52832-CIAA-G-R7" WLCSP-50_L3.2-W3.0-TL_NRF52832 90.3,112.35 r180 top
U1_R32 "NRF52832-CIAA-G-R7" WLCSP-50_L3.2-W3.0-TL_NRF52832 109.3,112.35 r180 top
U1_R33 "NRF52832-CIAA-G-R7" WLCSP-50_L3.2-W3.0-TL_NRF52832 128.3,112.35 r180 top
U1_R34 "NRF52832-CIAA-G-R7" WLCSP-50_L3.2-W3.0-TL_NRF52832 147.3,112.35 r180 top
U1_R41 "NRF52832-CIAA-G-R7" WLCSP-50_L3.2-W3.0-TL_NRF52832 90.3,124.15 r180 top
U1_R42 "NRF52832-CIAA-G-R7" WLCSP-50_L3.2-W3.0-TL_NRF52832 109.3,124.15 r180 top
U1_R43 "NRF52832-CIAA-G-R7" WLCSP-50_L3.2-W3.0-TL_NRF52832 128.3,124.15 r180 top
U1_R44 "NRF52832-CIAA-G-R7" WLCSP-50_L3.2-W3.0-TL_NRF52832 147.3,124.15 r180 top
U1_R51 "NRF52832-CIAA-G-R7" WLCSP-50_L3.2-W3.0-TL_NRF52832 90.3,135.95 r180 top
U1_R52 "NRF52832-CIAA-G-R7" WLCSP-50_L3.2-W3.0-TL_NRF52832 109.3,135.95 r180 top
U1_R53 "NRF52832-CIAA-G-R7" WLCSP-50_L3.2-W3.0-TL_NRF52832 128.3,135.95 r180 top